# Altium PCB PCB1_ASCII.pcbdoc (part 1 of 3)
Units mm, origin at the board's own origin, x right, y up, seen from the top; angles counter-clockwise.
Board outline 135 x 100 mm, 4 copper layers (Top Layer, GND, VCC, Bottom Layer), stack 1.757 mm thick; 175 components, 160 nets, 705 pads, 758 vias.
Unrouted connection lines stored in the file: 8.
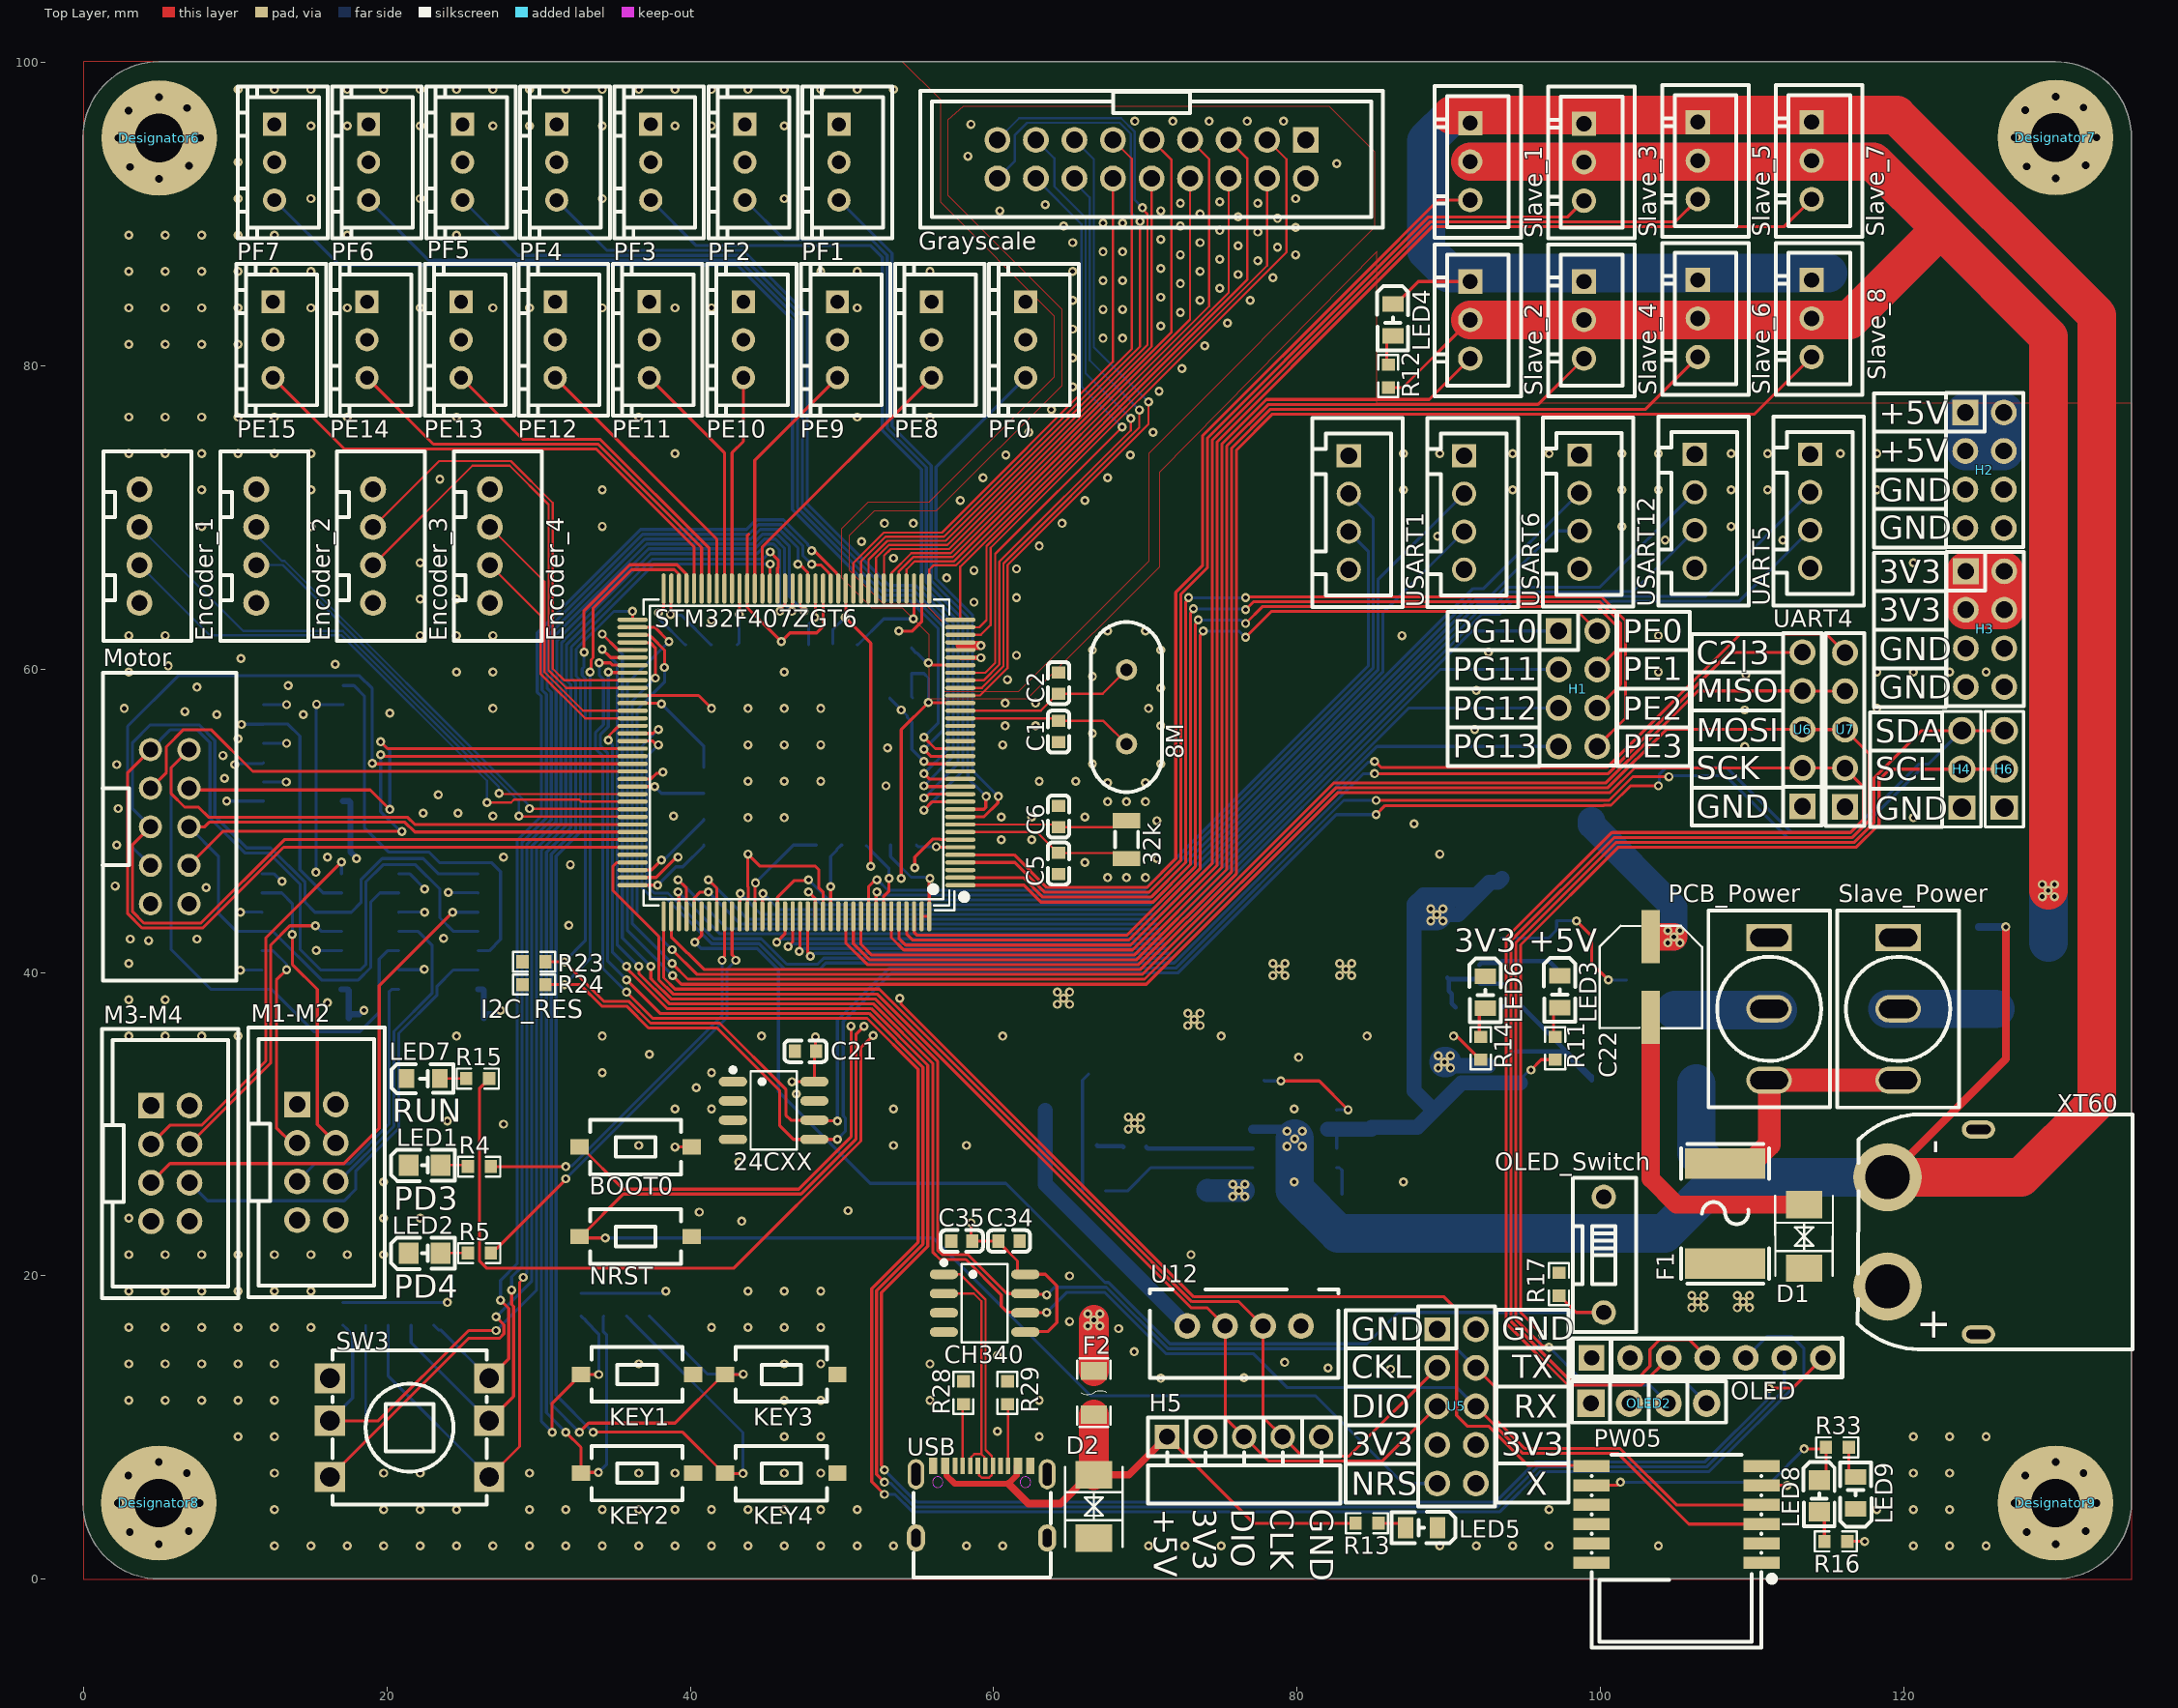
[diagram p0: Top Layer view]
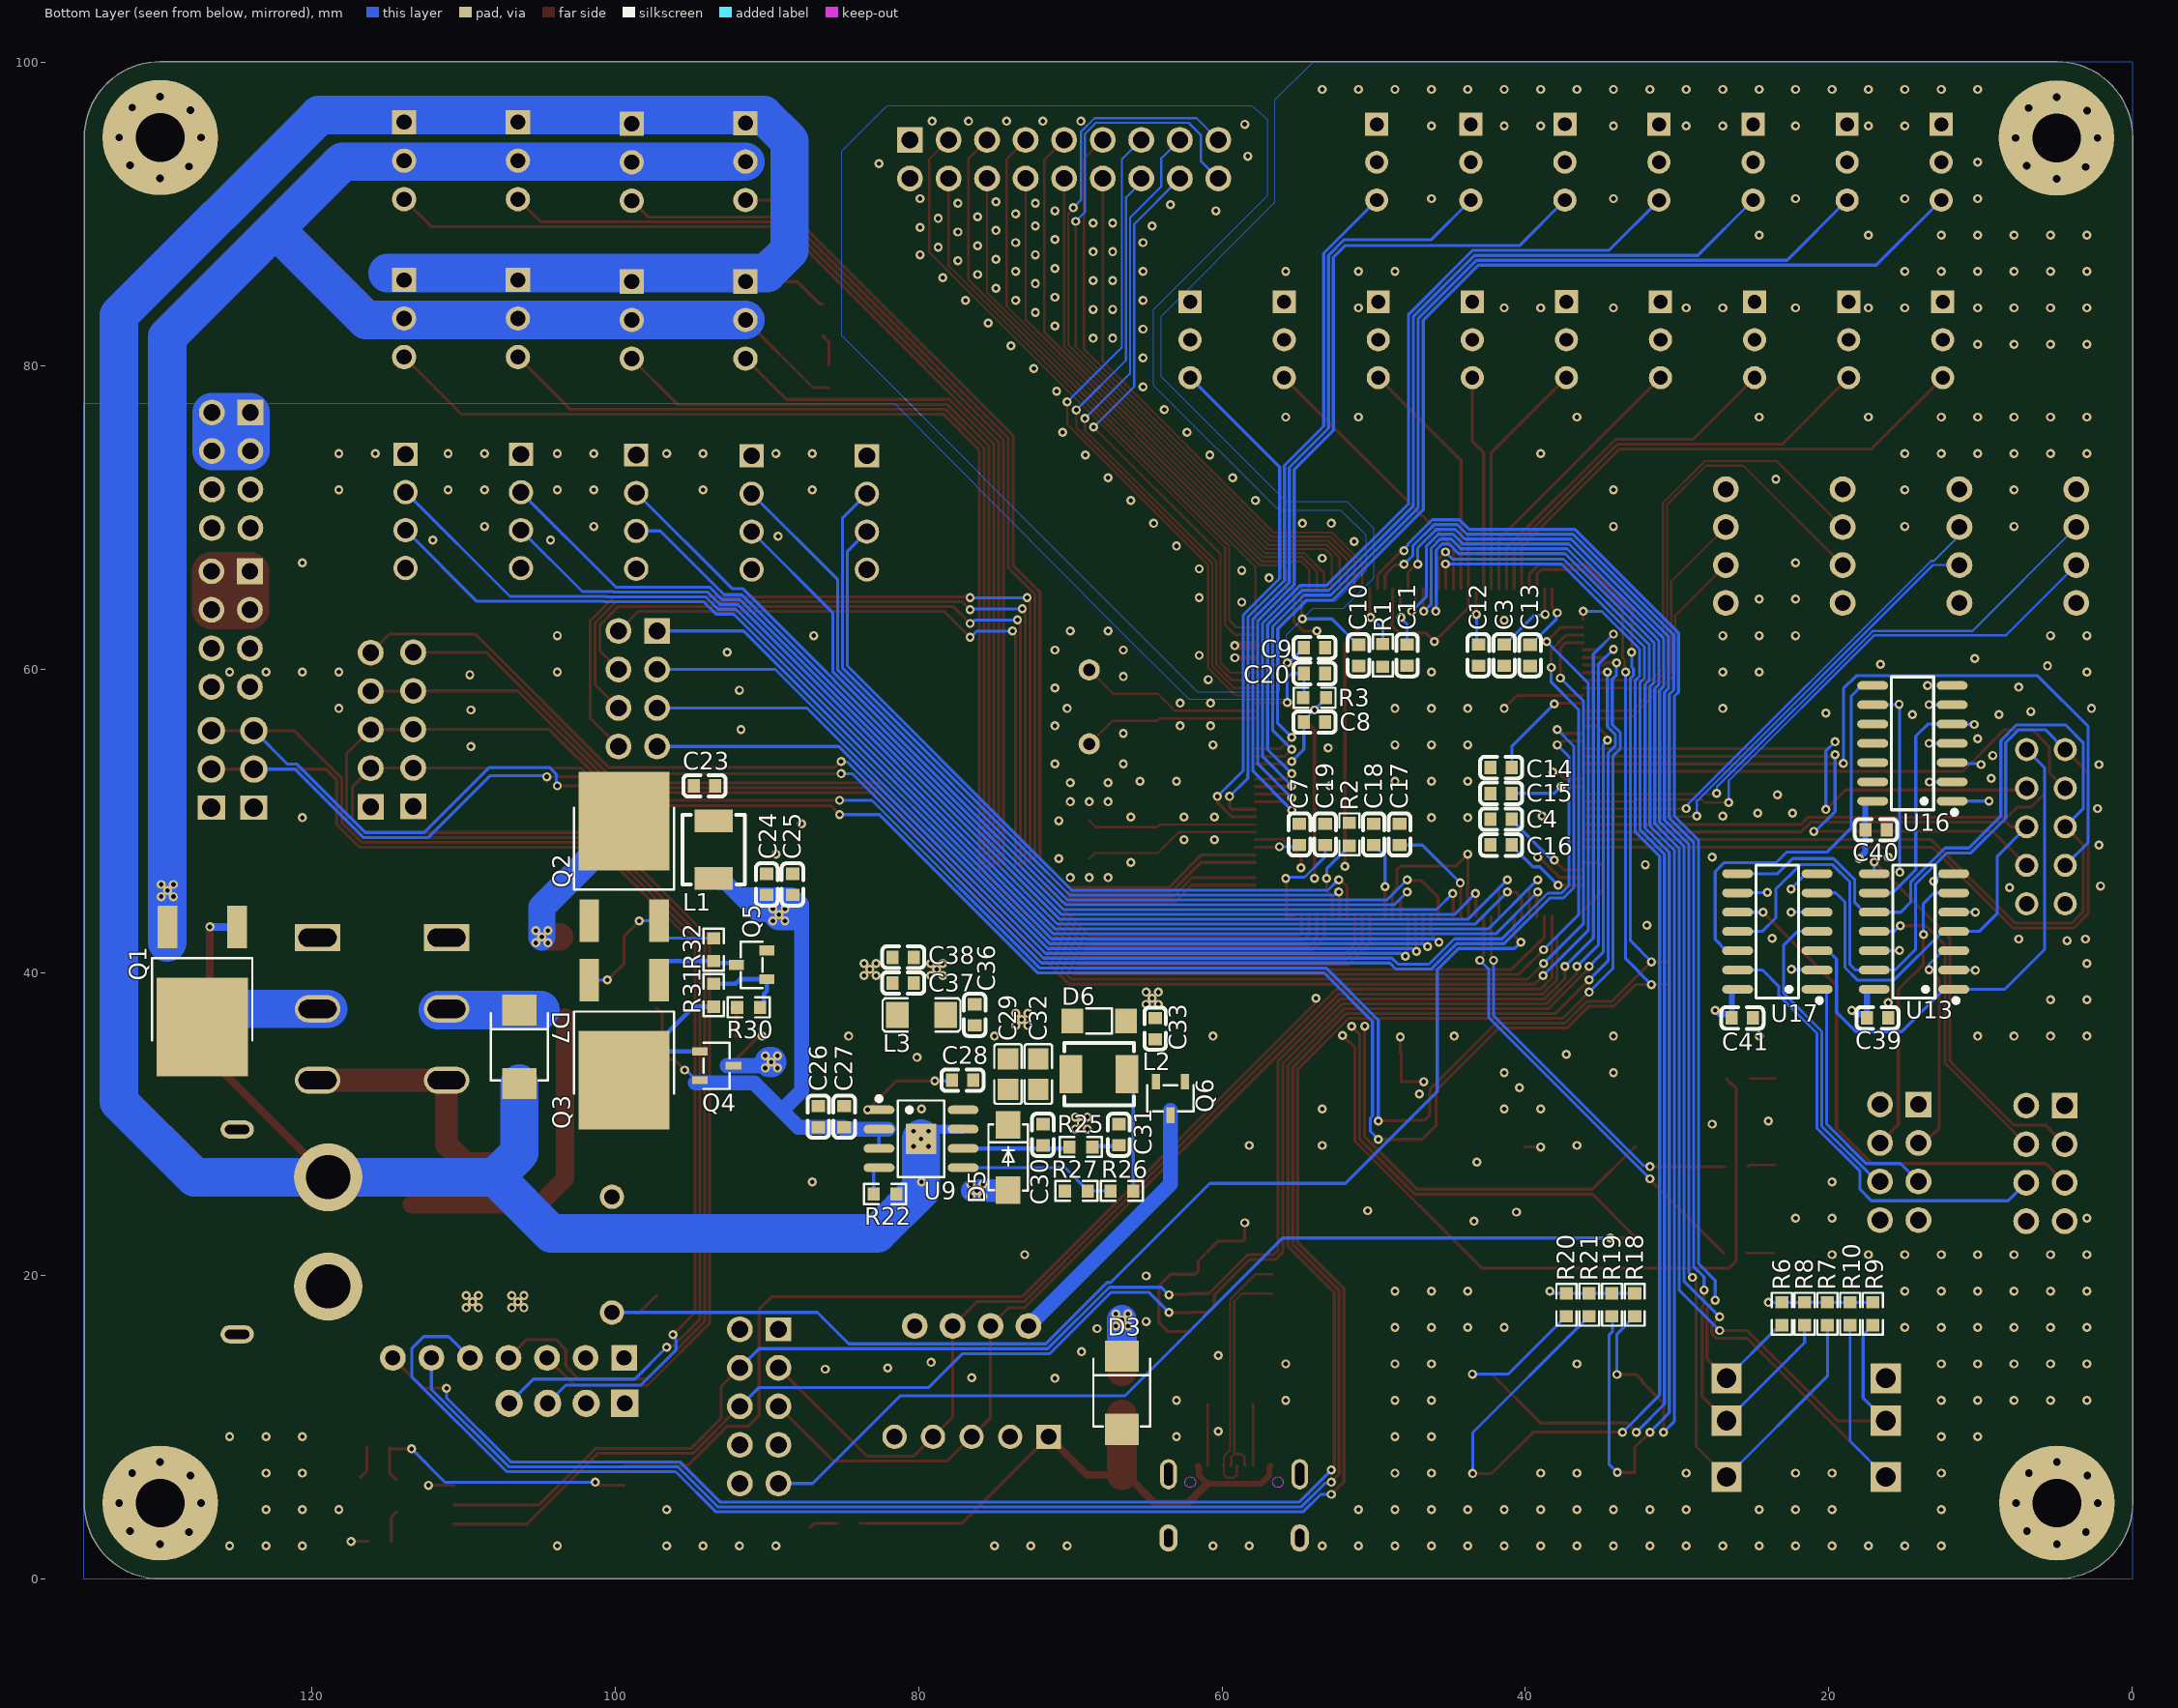
[diagram p1: Bottom Layer view, seen from below]
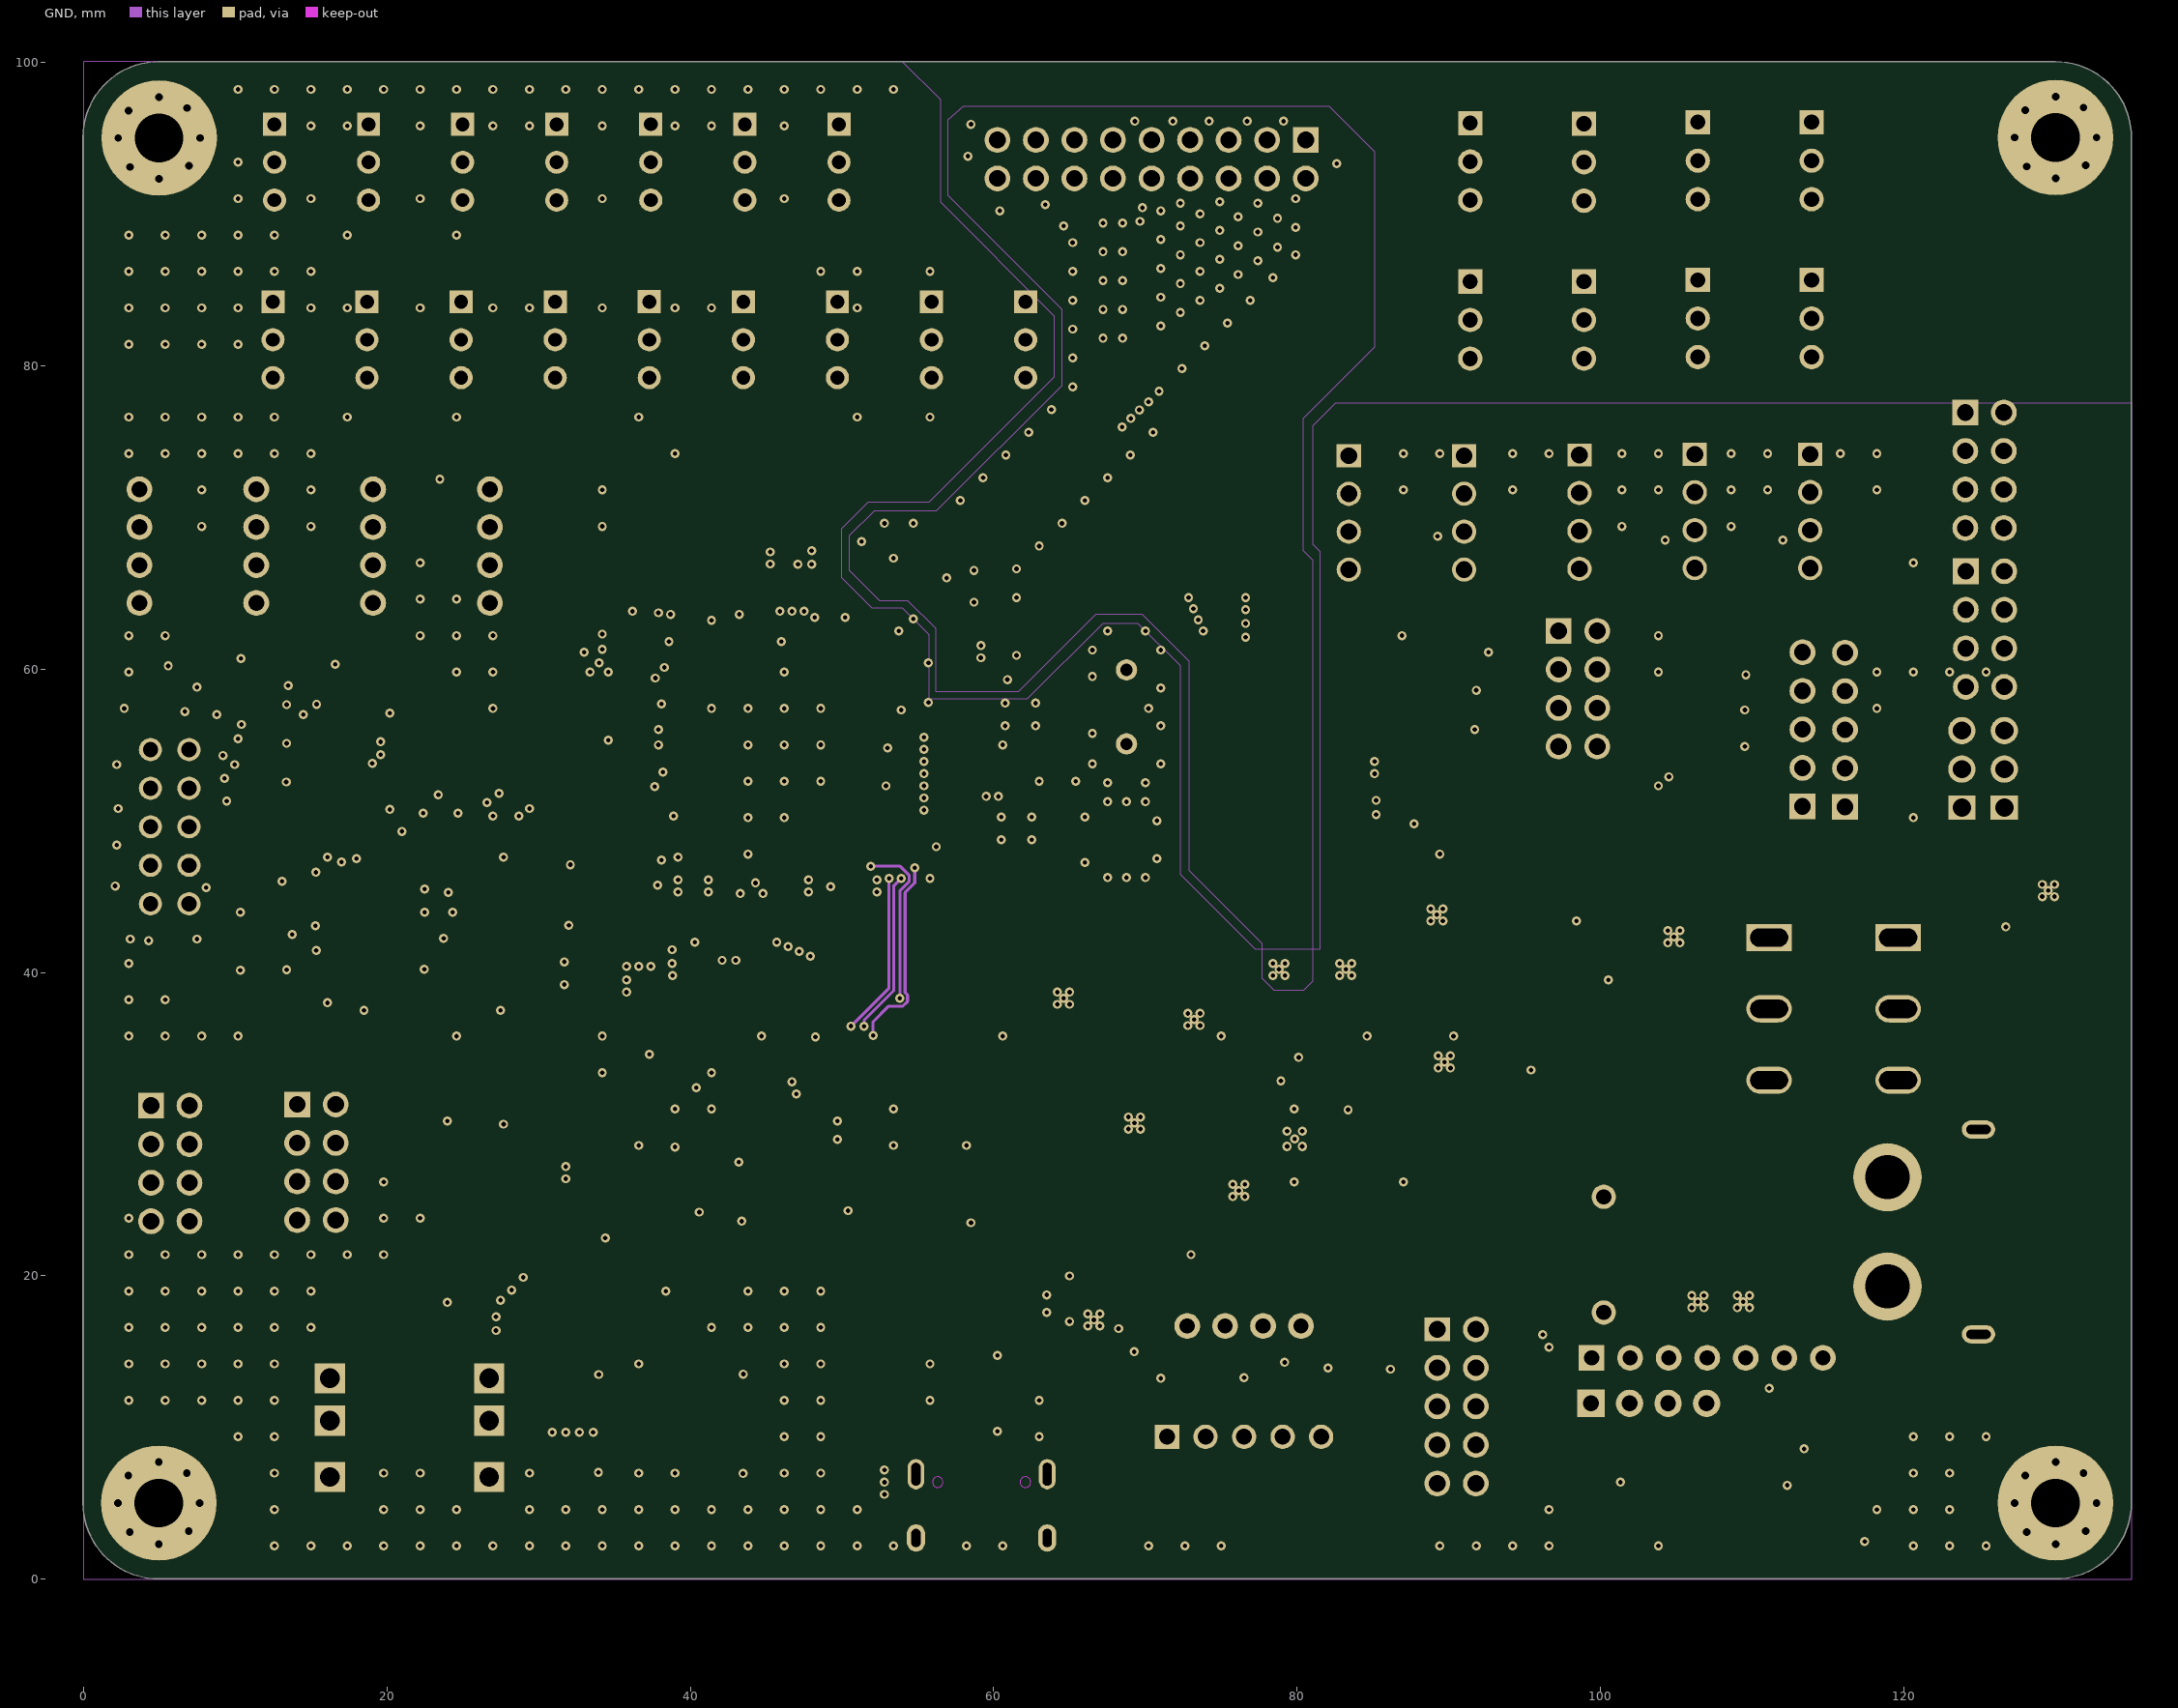
[diagram p2: GND]
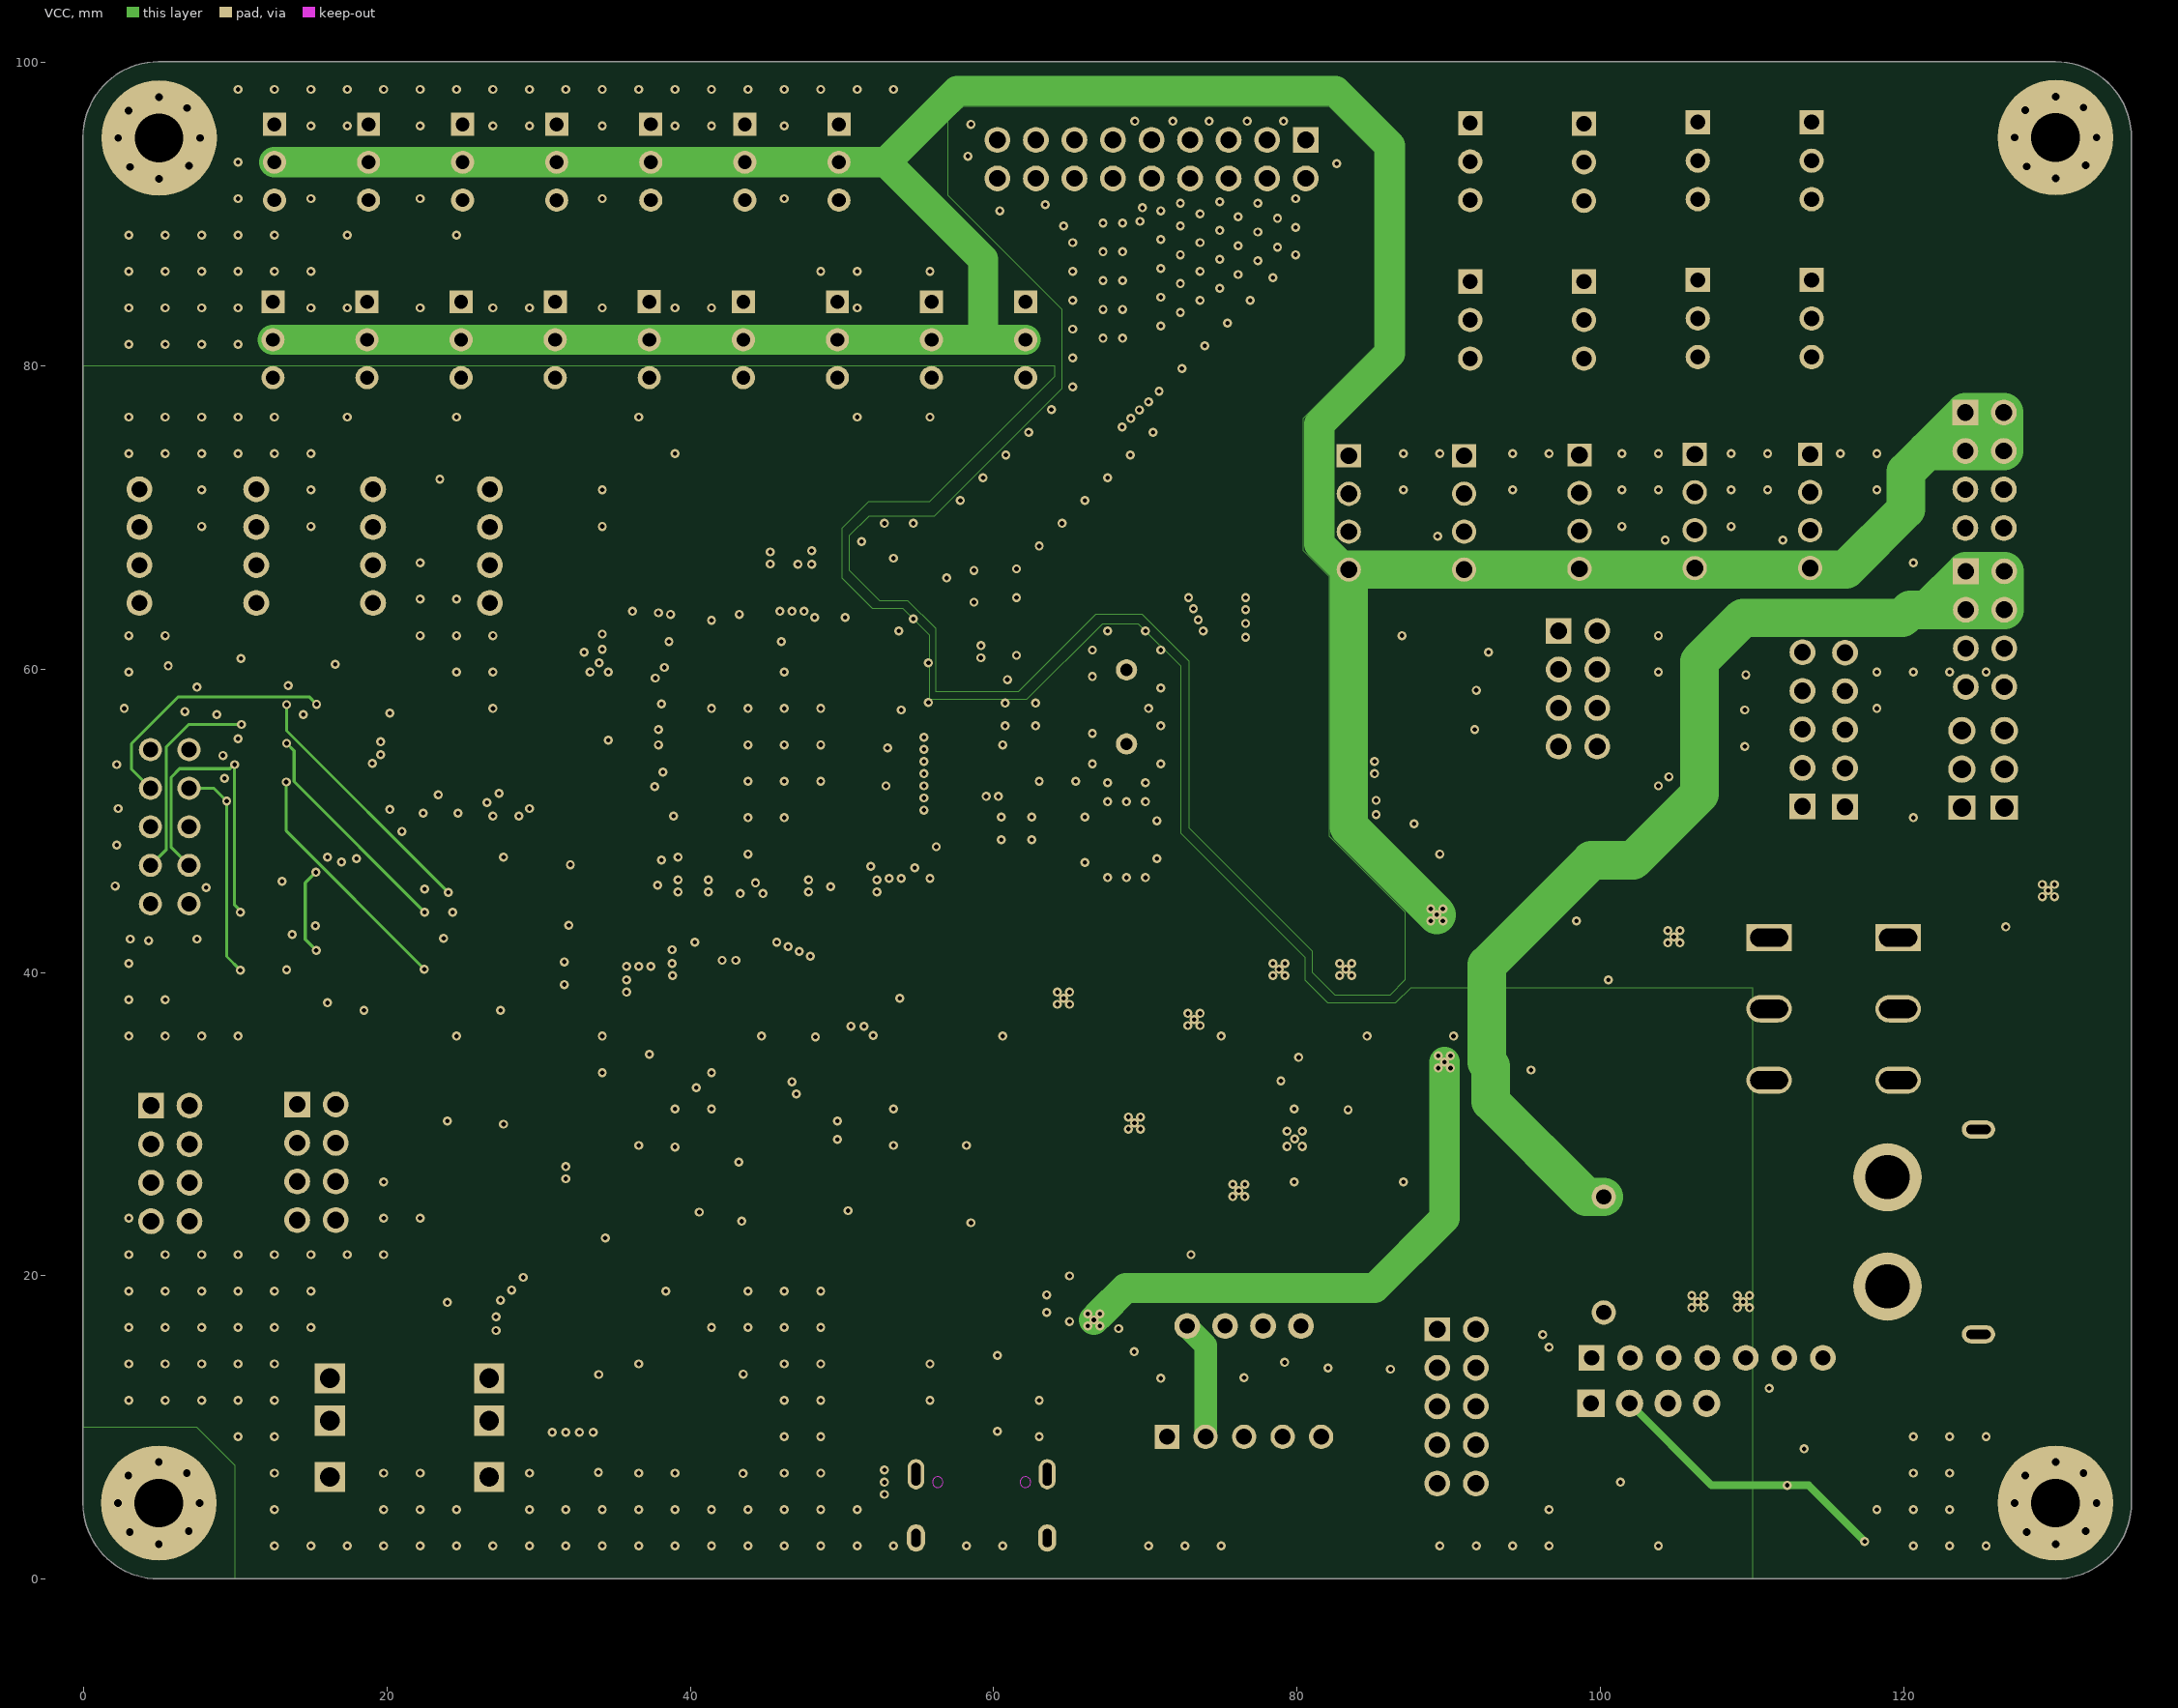
[diagram p3: VCC]

## Layer stack, top to bottom
Top Solder Mask Layer: solder mask 0.0102, Dk 3.3
Top Layer: signal copper 0.035
Dielectric 1: prepreg 0.0711, PP-006, Dk 4.1
GND: signal copper 0.018
Dielectric1: surface 1.5088, FR4, Dk 4.5
VCC: signal copper 0.018
Dielectric 2: prepreg 0.0711, PP-006, Dk 4.1
Bottom Layer: signal copper 0.035
Bottom Solder Mask Layer: solder mask 0.0102, Dk 3.3

## Board outline
-0.023,5.028 -0.023,95.028 cw(c4.977,95.028) 4.977,100.028 129.977,100.028 cw(c129.977,95.028) 134.977,95.028 134.977,5.028 cw(c129.977,5.028) 129.977,0.028 4.977,0.028 cw(c4.977,5.028)

## Design rules (kind name [scope] priority, off if disabled: settings)
AssemblyTestPointUsage [All] p0: scope1count=1 scope1_0_kind=Board scope1_0_value=Board scope2count=1 scope2_0_kind=Board scope2_0_value=Board commentlength=0
AssemblyTestpoint [All] p0: scope1count=1 scope1_0_kind=Board scope1_0_value=Board scope2count=1 scope2_0_kind=Board scope2_0_value=Board commentlength=0
BoardOutlineClearance copperThickness2oz_1 [All] p0: scope1count=1 scope1_0_kind=Board scope1_0_value=Board scope2count=1 scope2_0_kind=Board scope2_0_value=Board commentlength=0 gap=0.254
BoardOutlineClearance copperThickness1oz_1 [All] p0: scope1count=1 scope1_0_kind=Board scope1_0_value=Board scope2count=1 scope2_0_kind=Board scope2_0_value=Board commentlength=0 gap=0.254
BoardOutlineClearance copperThickness1oz_1 [All] p1: gap=0.254 ignorepadtopadclearanceinfootprint=FALSE except(0: Arc-SplitContinuation Track-SplitContinuation SMDPad-SplitContinuation THPad-SplitContinuation Via-SplitContinuation Fill-SplitContinuation Poly-SplitContinuation Region-SplitContinuation Text-SplitContinuation; 0.152: Track-CutoutEdge SMDPad-CutoutEdge THPad-CutoutEdge Via-CutoutEdge Region-CutoutEdge; 0.3: Track-OutlineEdge SMDPad-OutlineEdge THPad-OutlineEdge Via-OutlineEdge Fill-OutlineEdge Fill-CutoutEdge Poly-OutlineEdge Region-OutlineEdge Text-OutlineEdge)
BoardOutlineClearance copperThickness2oz_1 [All] p2: gap=0.254 ignorepadtopadclearanceinfootprint=FALSE except(0: Arc-SplitContinuation Track-SplitContinuation SMDPad-SplitContinuation THPad-SplitContinuation Via-SplitContinuation Fill-SplitContinuation Poly-SplitContinuation Region-SplitContinuation Text-SplitContinuation; 0.152: Track-CutoutEdge SMDPad-CutoutEdge THPad-CutoutEdge Via-CutoutEdge Region-CutoutEdge; 0.3: Track-OutlineEdge SMDPad-OutlineEdge THPad-OutlineEdge Via-OutlineEdge Fill-OutlineEdge Fill-CutoutEdge Poly-OutlineEdge Region-OutlineEdge Text-OutlineEdge)
Clearance copperThickness1oz [All] p0: scope1count=1 scope1_0_kind=Board scope1_0_value=Board scope2count=1 scope2_0_kind=Board scope2_0_value=Board commentlength=0 gap=0.2
Clearance "Stitching GND" [All] p0 off: scope1count=1 scope1_0_kind=Board scope1_0_value=Board scope2count=1 scope2_0_kind=Board scope2_0_value=Board commentlength=80 gap=0.2 // Protel DXP Scope 2 Expression Was: (IsVia and (Not IsStitchingVia)) Or IsPad
Clearance "Stitching GND" [IsStitchingVia and InNet('GND') vs (IsVia and (Not IsStitchingVia)) Or IsPad] p1: gap=0.2 ignorepadtopadclearanceinfootprint=FALSE except(0: Arc-Text Arc-Hole Track-Text Track-Hole SMDPad-Text SMDPad-Hole THPad-Text THPad-Hole Via-Text Via-Hole Fill-Text Fill-Hole Poly-Text Poly-Hole Region-Text Region-Hole Text-Text Text-Hole)
Clearance copperThickness1oz [All] p2: gap=0.2 ignorepadtopadclearanceinfootprint=FALSE except(0: Arc-Text Arc-Hole Track-Text Track-Hole SMDPad-Via SMDPad-Text SMDPad-Hole THPad-Via THPad-Text THPad-Hole Via-Text Via-Hole Fill-Text Fill-Hole Poly-Text Poly-Hole Region-Text Region-Hole Text-Text Text-Hole; 0.12: Arc-Arc Arc-Track Arc-Via Track-Track Track-Via; 0.15: Arc-SMDPad Arc-THPad Track-SMDPad Track-THPad SMDPad-SMDPad SMDPad-THPad THPad-THPad)
ComponentClearance [All] p0: scope1count=1 scope1_0_kind=Board scope1_0_value=Board scope2count=1 scope2_0_kind=Board scope2_0_value=Board commentlength=0 gap=0 collisioncheckmode=3
ComponentClearance [All] p1: gap=0 collisioncheckmode=3 verticalgap=0.254 showdistances=FALSE
DiffPairsRouting DiffPairsRouting_85oum [All] p0 off: scope1count=1 scope1_0_kind=Board scope1_0_value=Board scope2count=1 scope2_0_kind=Board scope2_0_value=Board commentlength=71 // Protel DXP Scope 1 Expression Was: InDifferentialPairClass('85oum')
DiffPairsRouting DiffPairsRouting_90oum [All] p0 off: scope1count=1 scope1_0_kind=Board scope1_0_value=Board scope2count=1 scope2_0_kind=Board scope2_0_value=Board commentlength=71 // Protel DXP Scope 1 Expression Was: InDifferentialPairClass('90oum')
DiffPairsRouting DiffPairsRouting_90oum [InDifferentialPairClass('90oum')] p1: maxlimit=0.254 minlimit=0.1 mostfreqgap=0.12 toplayer_minwidth=0.1 toplayer_maxwidth=0.381 toplayer_prefwidth=0.125 midlayer1_minwidth=0.1 midlayer1_maxwidth=0.381 midlayer1_prefwidth=0.125 midlayer2_minwidth=0.1 midlayer2_maxwidth=0.381 midlayer2_prefwidth=0.125 bottomlayer_minwidth=0.1 bottomlayer_maxwidth=0.381 bottomlayer_prefwidth=0.125 maxuncoupledlength=12.7
DiffPairsRouting DiffPairsRouting_85oum [InDifferentialPairClass('85oum')] p2: maxlimit=0.254 minlimit=0.1 mostfreqgap=0.12 toplayer_minwidth=0.1 toplayer_maxwidth=0.381 toplayer_prefwidth=0.145 midlayer1_minwidth=0.1 midlayer1_maxwidth=0.381 midlayer1_prefwidth=0.145 midlayer2_minwidth=0.1 midlayer2_maxwidth=0.381 midlayer2_prefwidth=0.145 bottomlayer_minwidth=0.1 bottomlayer_maxwidth=0.381 bottomlayer_prefwidth=0.145 maxuncoupledlength=12.7
FabricationTestPointUsage [All] p0: scope1count=1 scope1_0_kind=Board scope1_0_value=Board scope2count=1 scope2_0_kind=Board scope2_0_value=Board commentlength=0 valid=0 allowmultiple=FALSE
FabricationTestpoint [All] p0: scope1count=1 scope1_0_kind=Board scope1_0_value=Board scope2count=1 scope2_0_kind=Board scope2_0_value=Board commentlength=0 side=3 testpointundercomponent=TRUE minsize=1.016 maxsize=2.54 preferedsize=1.524 minholesize=0 maxholesize=1.016 preferedholesize=0.813 testpointgrid=0.025
FanoutControl Fanout_Default [All] p0: scope1count=1 scope1_0_kind=Board scope1_0_value=Board scope2count=1 scope2_0_kind=Board scope2_0_value=Board commentlength=30 // Fanout_Default (Default Rule)
FanoutControl Fanout_Small [All] p0 off: scope1count=1 scope1_0_kind=Board scope1_0_value=Board scope2count=1 scope2_0_kind=Board scope2_0_value=Board commentlength=84 // Protel DXP Scope 1 Expression Was: (CompPinCount < 5)   Fanout_Small (Default Rule)
FanoutControl Fanout_SOIC [All] p0 off: scope1count=1 scope1_0_kind=Board scope1_0_value=Board scope2count=1 scope2_0_kind=Board scope2_0_value=Board commentlength=71 // Protel DXP Scope 1 Expression Was: IsSOIC   Fanout_SOIC (Default Rule)
FanoutControl Fanout_LCC [All] p0 off: scope1count=1 scope1_0_kind=Board scope1_0_value=Board scope2count=1 scope2_0_kind=Board scope2_0_value=Board commentlength=69 // Protel DXP Scope 1 Expression Was: IsLCC   Fanout_LCC (Default Rule)
FanoutControl Fanout_BGA [All] p0 off: scope1count=1 scope1_0_kind=Board scope1_0_value=Board scope2count=1 scope2_0_kind=Board scope2_0_value=Board commentlength=69 // Protel DXP Scope 1 Expression Was: IsBGA   Fanout_BGA (Default Rule)
Height [All] p0: scope1count=1 scope1_0_kind=Board scope1_0_value=Board scope2count=1 scope2_0_kind=Board scope2_0_value=Board commentlength=0
HoleSize [All] p0: scope1count=1 scope1_0_kind=Board scope1_0_value=Board scope2count=1 scope2_0_kind=Board scope2_0_value=Board commentlength=0 absolutevalues=TRUE maxlimit=2.54 minlimit=0.025 maxpercent=80.000 minpercent=20.000
HoleToHoleClearance [All] p0: scope1count=1 scope1_0_kind=Board scope1_0_value=Board scope2count=1 scope2_0_kind=Board scope2_0_value=Board commentlength=0
LayerPairs [All] p0: scope1count=1 scope1_0_kind=Board scope1_0_value=Board scope2count=1 scope2_0_kind=Board scope2_0_value=Board commentlength=0 enforce=TRUE
MatchedLengths [All] p0: scope1count=1 scope1_0_kind=Board scope1_0_value=Board scope2count=1 scope2_0_kind=Board scope2_0_value=Board commentlength=0 tolerance=2 amplitude=5.08 gap=0.508 style=90-Degree
MatchedLengths [All] p1: tolerance=2 checknetsindiffpair=FALSE checkdiffpairvsdiffpair=TRUE checkxsignals=TRUE checkothers=TRUE
MinimumSolderMaskSliver [All] p0: scope1count=1 scope1_0_kind=Board scope1_0_value=Board scope2count=1 scope2_0_kind=Board scope2_0_value=Board commentlength=0
NetAntennae [All] p0: scope1count=1 scope1_0_kind=Board scope1_0_value=Board scope2count=1 scope2_0_kind=Board scope2_0_value=Board commentlength=0
PasteMaskExpansion pasteMaskExpansion [All] p0: scope1count=1 scope1_0_kind=Board scope1_0_value=Board scope2count=1 scope2_0_kind=Board scope2_0_value=Board commentlength=0 expansion=0
PasteMaskExpansion pasteMaskExpansion [All] p1: expansion=0
PlaneClearance [All] p0: scope1count=1 scope1_0_kind=Board scope1_0_value=Board scope2count=1 scope2_0_kind=Board scope2_0_value=Board commentlength=0 clearance=0.508
PlaneConnect innerPlane [All] p0: scope1count=1 scope1_0_kind=Board scope1_0_value=Board scope2count=1 scope2_0_kind=Board scope2_0_value=Board commentlength=0 planeconnectstyle=Direct reliefexpansion=0.508 reliefentries=4 reliefconductorwidth=0.254 reliefairgap=0.254
PlaneConnect innerPlane [All] p1: planeconnectstyle=Direct reliefexpansion=0.508 reliefentries=4 reliefconductorwidth=0.254 reliefairgap=0.254
PolygonConnect copperRegion [All] p0: scope1count=1 scope1_0_kind=Board scope1_0_value=Board scope2count=1 scope2_0_kind=Board scope2_0_value=Board commentlength=0 connectstyle=Direct reliefconductorwidth=0.254 reliefentries=4 polygonreliefangle="90 Angle"
PolygonConnect copperRegion [All] p1: thpad.connectstyle=Direct thpad.reliefconductorwidth=0.254 thpad.reliefentries=4 thpad.polygonreliefangle="90 Angle" thpad.airgapwidth=0.254 smdpad.connectstyle=Relief smdpad.reliefconductorwidth=0.3 smdpad.reliefentries=4 smdpad.polygonreliefangle="90 Angle" smdpad.airgapwidth=0.3 via.connectstyle=Direct via.reliefconductorwidth=0.254 via.reliefentries=4 via.polygonreliefangle="90 Angle" via.airgapwidth=0.254
RoutingCorners [All] p0: scope1count=1 scope1_0_kind=Board scope1_0_value=Board scope2count=1 scope2_0_kind=Board scope2_0_value=Board commentlength=0 cornerstyle=45-Degree minsetback=2.54 maxsetback=2.54
RoutingLayers [All] p0: scope1count=1 scope1_0_kind=Board scope1_0_value=Board scope2count=1 scope2_0_kind=Board scope2_0_value=Board commentlength=0 top layer=Automatic mid layer 1=Automatic mid layer 2=Automatic bottom layer=Automatic
RoutingPriority [All] p0: scope1count=1 scope1_0_kind=Board scope1_0_value=Board scope2count=1 scope2_0_kind=Board scope2_0_value=Board commentlength=0
RoutingTopology [All] p0: scope1count=1 scope1_0_kind=Board scope1_0_value=Board scope2count=1 scope2_0_kind=Board scope2_0_value=Board commentlength=0 topology=Shortest
RoutingVias viaSize [All] p0: scope1count=1 scope1_0_kind=Board scope1_0_value=Board scope2count=1 scope2_0_kind=Board scope2_0_value=Board commentlength=0 holewidth=0.305 width=0.61 viastyle="Through Hole" minholewidth=0.3 minwidth=0.5 maxholewidth=6.3 maxwidth=10
RoutingVias viaSize [All] p1: holewidth=0.305 width=0.61 viastyle="Through Hole" minholewidth=0.3 minwidth=0.5 maxholewidth=6.3 maxwidth=10
ShortCircuit [All] p0: scope1count=1 scope1_0_kind=Board scope1_0_value=Board scope2count=1 scope2_0_kind=Board scope2_0_value=Board commentlength=0 allowed=FALSE
SilkToBoardRegionClearance [All] p0: scope1count=1 scope1_0_kind=Board scope1_0_value=Board scope2count=1 scope2_0_kind=Board scope2_0_value=Board commentlength=0
SilkToSilkClearance [All] p0: scope1count=1 scope1_0_kind=Board scope1_0_value=Board scope2count=1 scope2_0_kind=Board scope2_0_value=Board commentlength=0
SilkToSilkClearance [All] p1: silktosilkclearance=0
SilkToSolderMaskClearance [All] p0 off: scope1count=1 scope1_0_kind=Board scope1_0_value=Board scope2count=1 scope2_0_kind=Board scope2_0_value=Board commentlength=44 // Protel DXP Scope 1 Expression Was: IsPad
SilkToSolderMaskClearance [IsPad] p1: minsilkscreentomaskgap=0 clearancetoexposedcopper=TRUE
SolderMaskExpansion solderMaskExpansion [All] p0: scope1count=1 scope1_0_kind=Board scope1_0_value=Board scope2count=1 scope2_0_kind=Board scope2_0_value=Board commentlength=0 expansion=0.051
SolderMaskExpansion solderMaskExpansion [All] p1: expansion=0.051 istentingtop=FALSE useseparateexpansions=TRUE expansionbottom=0.051 istentingbottom=FALSE
SupplyNets "Schematic Supply Nets" [All] p0: scope1count=1 scope1_0_kind=Net scope1_0_value=3V3 scope2count=1 scope2_0_kind=Board scope2_0_value=Board commentlength=0 voltage=0.000
SupplyNets "Schematic Supply Nets_1" [All] p0: scope1count=1 scope1_0_kind=Net scope1_0_value=VDDREG scope2count=1 scope2_0_kind=Board scope2_0_value=Board commentlength=0 voltage=0.000
SupplyNets "Schematic Supply Nets_2" [All] p0: scope1count=1 scope1_0_kind=Net scope1_0_value=GND scope2count=1 scope2_0_kind=Board scope2_0_value=Board commentlength=0 voltage=0.000
SupplyNets "Schematic Supply Nets_3" [All] p0: scope1count=1 scope1_0_kind=Net scope1_0_value=AVDDL scope2count=1 scope2_0_kind=Board scope2_0_value=Board commentlength=0 voltage=0.000
SupplyNets "Schematic Supply Nets_4" [All] p0: scope1count=1 scope1_0_kind=Net scope1_0_value=M.2_3V3 scope2count=1 scope2_0_kind=Board scope2_0_value=Board commentlength=0 voltage=0.000
SupplyNets "Schematic Supply Nets_5" [All] p0: scope1count=1 scope1_0_kind=Net scope1_0_value=VCC scope2count=1 scope2_0_kind=Board scope2_0_value=Board commentlength=0 voltage=0.000
SupplyNets "Schematic Supply Nets_5" [InNet('VCC')] p1: voltage=0.000
SupplyNets "Schematic Supply Nets_4" [InNet('M.2_3V3')] p2: voltage=0.000
SupplyNets "Schematic Supply Nets_3" [InNet('AVDDL')] p3: voltage=0.000
SupplyNets "Schematic Supply Nets_2" [InNet('GND')] p4: voltage=0.000
SupplyNets "Schematic Supply Nets_1" [InNet('VDDREG')] p5: voltage=0.000
SupplyNets "Schematic Supply Nets" [InNet('3V3')] p6: voltage=0.000
UnRoutedNet [All] p0: scope1count=1 scope1_0_kind=Board scope1_0_value=Board scope2count=1 scope2_0_kind=Board scope2_0_value=Board commentlength=0
UnpouredPolygon [All] p0: scope1count=1 scope1_0_kind=Board scope1_0_value=Board scope2count=1 scope2_0_kind=Board scope2_0_value=Board commentlength=0
Width copperThickness1oz_2 [All] p0: scope1count=1 scope1_0_kind=Board scope1_0_value=Board scope2count=1 scope2_0_kind=Board scope2_0_value=Board commentlength=0 maxlimit=2.54 minlimit=0.127 preferedwidth=0.254
Width copperThickness1oz_2 [All] p1: maxlimit=2.54 minlimit=0.127 preferedwidth=0.254
24 further rules are at their usual default settings.

## Components (designator, comment, footprint, x,y, rotation, side; value= is the part's Value field where it differs from the comment)
8M "8MHz" CRYSTAL-TH_L11.1-W4.7-P4.88 68.75,57.5 r270 top (schematic designator X1)
24CXX "AT24C64" SOP-8_L4.9-W3.9-P1.27-LS6.0-BL#1 45.5,30.9 r270 top locked (schematic designator U2)
32k "32.768kHz" FC-135R_L3.2-W1.5 68.75,48.75 r270 top (schematic designator X2)
BOOT0 "TS-1101-C-W" SW-SMD_L6.0-W3.3-LS8.0_TS-1101-C-W 36.4,28.5 r0 top locked (schematic designator SW1)
C1 "100nF" C0603#1 64.275,55.875 r90 top
C2 "100nF" C0603#1 64.275,59.075 r270 top
C3 "100nF" C0603#1 41.4,60.9 r270 bottom
C4 "100nF" C0603#1 41.6,50.1 r0 bottom
C5 "100nF" C0603#1 64.275,47.175 r90 top
C6 "100nF" C0603#1 64.275,50.275 r270 top
C7 "100nF" C0603#1 54.9,49.1 r270 bottom
C8 "100nF" C0603#2 53.9,56.5 r0 bottom
C9 "100nF" C0603#1 53.9,61.4 r0 bottom
C10 "100nF" C0603#1 51,60.9 r90 bottom
C11 "100nF" C0603#2 47.8,60.9 r90 bottom
C12 "100nF" C0603#2 43.1,60.9 r90 bottom
C13 "100nF" C0603#1 39.7,60.9 r90 bottom
C14 "100nF" C0603#3 41.6,53.5 r180 bottom
C15 "100nF" C0603#2 41.6,51.8 r180 bottom
C16 "100nF" C0603#1 41.6,48.4 r180 bottom
C17 "100nF" C0603#3 48.3,49.1 r270 bottom
C18 "100nF" C0603#2 50,49.1 r270 bottom
C19 "100nF" C0603#1 53.2,49.1 r270 bottom
C20 "100nF" C0603#3 53.899,59.7 r0 bottom
C21 "100nF" C0603#2 47.6,34.8 r180 top
C22 "470uF" CAP-SMD_BD6.3-L6.6-W6.6-LS7.3-FD-H7.7 103.3,39.7 r270 top
C23 "100nF" C0603#3 94.1,52.3 r0 bottom
C24 "100nF" C0603#1 90,45.8 r270 bottom
C25 "100nF" C0603#1 88.3,45.8 r270 bottom
C26 "100nF" C0603#3 86.6,30.5 r270 bottom
C27 "100nF" C0603#2 84.9,30.5 r270 bottom
C28 "100nF" C0603#2 77.1,32.9 r0 bottom
C29 "47uF" C0805#1 74.1,33.3 r270 bottom
C30 "100nF" C0603#2 71.8,29.3 r270 bottom
C31 "100nF" C0603#1 66.8,29.3 r270 bottom
C32 "47uF" C0805#2 72.1,33.3 r270 bottom
C33 "100nF" C0603#3 64.4,36.3 r90 bottom
C34 "100nF" C0603#2 61,22.3 r0 top
C35 "100nF" C0603#2 57.9,22.3 r180 top
C36 "100nF" C0603#2 76.3,37.2 r90 bottom
C37 "100nF" C0603#3 81,39.3 r0 bottom
C38 "100nF" C0603#2 81,41 r0 bottom
C39 "100nF" C0603#1 16.8,37 r180 bottom
C40 "100nF" C0603#1 16.9,49.4 r180 bottom
C41 "100nF" C0603#3 25.7,37 r180 bottom
CH340 "CH340N" SOP-8_L4.9-W3.9-P1.27-LS6.0-BL#2 59.4,18.2 r270 top locked (schematic designator U10)
D1 "SMBJ6.5CA" SMB_L4.6-W3.5-LS5.3-BI#1 113.4,22.6 r90 top
D2 "SMBJ6.5CA" SMB_L4.6-W3.5-LS5.3-BI#2 66.6,4.8 r270 top locked
D3 "SMBJ5339B" SMB_L4.6-W3.6-LS5.4-RD 66.6,12.3 r270 bottom
D5 "SS54" SMA_L4.3-W2.6-LS5.0-FD 74.1,27.8 r90 bottom
D6 "BZV55-C3V3,115-JSM" SOD-80_L3.5-W1.5-RD 68.1,36.8 r0 bottom
D7 "SMBJ5339B" SMB_L4.6-W3.6-LS5.4-RD 106.3,35.1 r270 bottom
Designator6 "Comment" M3 5,95 r0 top locked
Designator7 "Comment" M3 129.977,95.028 r0 top
Designator8 "Comment" M3 4.977,5.028 r0 top locked
Designator9 "Comment" M3 129.977,5.028 r0 top locked
Encoder_1 "HX-XH2.54-4PZZ" CONN-TH_4P-P2.50-XH2.54-4P#1 3.7,68.1 r90 top locked (schematic designator CN25)
Encoder_2 "HX-XH2.54-4PZZ" CONN-TH_4P-P2.50-XH2.54-4P#2 11.4,68.1 r90 top locked (schematic designator CN31)
Encoder_3 "HX-XH2.54-4PZZ" CONN-TH_4P-P2.50-XH2.54-4P#1 19.1,68.1 r90 top locked (schematic designator CN26)
Encoder_4 "HX-XH2.54-4PZZ" CONN-TH_4P-P2.50-XH2.54-4P#2 26.8,68.1 r90 top locked (schematic designator CN32)
F1 "2920L500/24GR" F2920 108.2,24.1 r90 top
F2 "SMD1206-100-30" F1206 66.6,12.3 r90 top
Grayscale "XDFH-0254-2*9P" CONN-TH_18P-P2.54_LX_XDFH-0254-2X9P 70.4,93.6 r180 top locked (schematic designator U8)
H1 "PZ254V-12-8P" HDR-TH_8P-P2.54-V-M-R2-C4-S2.54 98.5,58.7 r270 top
H2 "PZ254V-12-8P" HDR-TH_8P-P2.54-V-M-R2-C4-S2.54 125.3,73.1 r270 top
H3 "PZ254V-12-8P" HDR-TH_8P-P2.54-V-M-R2-C4-S2.54 125.33,62.63 r270 top
H4 "12251103CNG0S115001" HDR-TH_3P-P2.54-V-M-1 123.8,53.4 r90 top
H5 "PZ254-1-05-W-8.5" HDR-TH_5P-P2.54-H-M-W10.4-N 76.5,9.4 r0 top
H6 "12251103CNG0S115001" HDR-TH_3P-P2.54-V-M-1 126.6,53.4 r90 top
KEY1 "TS-1101-C-W" SW-SMD_L6.0-W3.3-LS8.0_TS-1101-C-W 36.5,13.5 r0 top (schematic designator SW5)
KEY2 "TS-1101-C-W" SW-SMD_L6.0-W3.3-LS8.0_TS-1101-C-W 36.5,7 r0 top (schematic designator SW6)
KEY3 "TS-1101-C-W" SW-SMD_L6.0-W3.3-LS8.0_TS-1101-C-W 46,13.5 r0 top (schematic designator SW7)
KEY4 "TS-1101-C-W" SW-SMD_L6.0-W3.3-LS8.0_TS-1101-C-W 46,7 r0 top (schematic designator SW8)
L1 "4.7uH" IND-SMD_L4.6-W4.1-A 93.5,48.1 r270 bottom
L2 "2.2uH" IND-SMD_L4.6-W4.1_MHCI04015 68.1,33.3 r180 bottom
L3 "SBH3216S221QSP" L1206 79.8,37.2 r0 bottom
LED1 "GL0805UG01" LED0805-FD_GL0805UG01#1 22.5,27.3 r180 top
LED2 "GL0805UG01" LED0805-FD_GL0805UG01#1 22.498,21.5 r180 top
LED3 "GL0805UR01" LED0805-R-RD_RED#1 97.3,38.732 r270 top
LED4 "GL0805UR01" LED0805-R-RD_RED#1 86.3,83 r270 top
LED5 "GL0805UR01" LED0805-R-RD_RED#1 88.2,3.4 r180 top
LED6 "GL0805UR01" LED0805-R-RD_RED#1 92.4,38.7 r270 top
LED7 "GL0805UB01" LED0805-RD_BLUE 22.4,33 r0 top
LED8 "GL0805UG01" LED0805-FD_GL0805UG01#2 114.4,5.5 r90 top
LED9 "GL0805UR01" LED0805-R-RD_RED#2 116.8,5.7 r90 top
M1-M2 "XDFH-0254-2*4P" CONN-TH_8P-P2.54_LX_XDFH-0254-2X4P 15.37,27.49 r270 top locked (schematic designator U14)
M3-M4 "XDFH-0254-2*4P" CONN-TH_8P-P2.54_LX_XDFH-0254-2X4P 5.73,27.41 r270 top locked (schematic designator U15)
Motor "2.54-2*5P简牛" IDC-TH_10P-P2.54_C5665 5.7,49.6 r270 top locked (schematic designator P1)
NRST "TS-1101-C-W" SW-SMD_L6.0-W3.3-LS8.0_TS-1101-C-W 36.4,22.6 r0 top locked (schematic designator SW2)
OLED "HS96L01W4S03" OLED-TH_HS96L01W4S03 107.02,14.6 r0 top locked (schematic designator OLED1)
OLED2 "HS96L03W2C03" OLED-TH_L27.8-W27.2-P2.54_C9900033791 103.17,11.6 r0 top locked
OLED_Switch "DSWB01LHGET" SW-TH_DSWB01LHGET 100.2,21.4 r0 top (schematic designator SW4)
PCB_Power "MT-0-102-A101-M200-RS" SW-TH_MT-0-103-A101-M200-RS#1 111.1,37.602 r270 top locked (schematic designator U4)
PE8 "HX-XH2.54-3PZZ" CONN-TH_3P-P2.50_HC-XH-3A-G#1 55.9,81.7 r270 top (schematic designator CN15)
PE9 "HX-XH2.54-3PZZ" CONN-TH_3P-P2.50_HC-XH-3A-G#1 49.7,81.7 r270 top (schematic designator CN17)
PE10 "HX-XH2.54-3PZZ" CONN-TH_3P-P2.50_HC-XH-3A-G#1 43.5,81.7 r270 top (schematic designator CN19)
PE11 "HX-XH2.54-3PZZ" CONN-TH_3P-P2.50_HC-XH-3A-G#2 37.3,81.7 r270 top (schematic designator CN21)
PE12 "HX-XH2.54-3PZZ" CONN-TH_3P-P2.50_HC-XH-3A-G#3 31.1,81.7 r270 top (schematic designator CN23)
PE13 "HX-XH2.54-3PZZ" CONN-TH_3P-P2.50_HC-XH-3A-G#1 24.9,81.7 r270 top (schematic designator CN27)
PE14 "HX-XH2.54-3PZZ" CONN-TH_3P-P2.50_HC-XH-3A-G#1 18.7,81.7 r270 top (schematic designator CN29)
PE15 "HX-XH2.54-3PZZ" CONN-TH_3P-P2.50_HC-XH-3A-G#1 12.5,81.7 r270 top (schematic designator CN33)
PF0 "HX-XH2.54-3PZZ" CONN-TH_3P-P2.50_HC-XH-3A-G#1 62.1,81.7 r270 top (schematic designator CN16)
PF1 "HX-XH2.54-3PZZ" CONN-TH_3P-P2.50_HC-XH-3A-G#1 49.8,93.4 r270 top (schematic designator CN18)
PF2 "HX-XH2.54-3PZZ" CONN-TH_3P-P2.50_HC-XH-3A-G#1 43.6,93.4 r270 top (schematic designator CN20)
PF3 "HX-XH2.54-3PZZ" CONN-TH_3P-P2.50_HC-XH-3A-G#2 37.4,93.4 r270 top (schematic designator CN22)
PF4 "HX-XH2.54-3PZZ" CONN-TH_3P-P2.50_HC-XH-3A-G#3 31.2,93.4 r270 top (schematic designator CN24)
PF5 "HX-XH2.54-3PZZ" CONN-TH_3P-P2.50_HC-XH-3A-G#1 25,93.4 r270 top (schematic designator CN28)
PF6 "HX-XH2.54-3PZZ" CONN-TH_3P-P2.50_HC-XH-3A-G#1 18.8,93.4 r270 top (schematic designator CN30)
PF7 "HX-XH2.54-3PZZ" CONN-TH_3P-P2.50_HC-XH-3A-G#1 12.6,93.4 r270 top (schematic designator CN34)
PW05 "" BULETM-SMD_RF-BM-4044B2 104.999,2.383 r180 top locked (schematic designator U11)
Q1 "HB03P250S" TO-252-2_L6.6-W6.1-P4.60-LS10.0-BR-CW#1 127.2,39.7 r90 bottom
Q2 "HB03P250S" TO-252-2_L6.6-W6.1-P4.60-LS10.0-BR-CW#2 99.399,46.692 r270 bottom locked
Q3 "HB03P250S" TO-252-2_L6.6-W6.1-P4.60-LS10.0-BR-CW#2 99.4,36.192 r90 bottom locked
Q4 "HL3401" SOT-23-3_L3.0-W1.7-P0.95-LS2.9-BR 93.3,33.85 r0 bottom
Q5 "SS8050" SOT-23-3_L2.9-W1.3-P1.90-LS2.4-BR 91,40.5 r180 bottom
Q6 "HL3401" SOT-23-3_L3.0-W1.7-P0.95-LS2.9-BR 63.4,31.7 r90 bottom
R1 "10K" R0603#1 49.4,60.9 r270 bottom
R2 "10K" R0603#1 51.6,49.1 r90 bottom
R3 "10K" R0603#1 53.9,58.1 r180 bottom
R4 "31.6kΩ" R0603#2 26.1,27.2 r0 top
R5 "31.6kΩ" R0603#2 26.098,21.5 r0 top
R6 "10K" R0603#1 23.1,17.5 r90 bottom
R7 "10K" R0603#1 20.1,17.5 r90 bottom
R8 "10K" R0603#1 21.6,17.5 r90 bottom
R9 "10K" R0603#1 17.1,17.5 r90 bottom
R10 "10K" R0603#1 18.6,17.5 r90 bottom
R11 "31.6kΩ" R0603#2 97,35 r270 top
R12 "31.6kΩ" R0603#2 86,79.3 r270 top
R13 "31.6kΩ" R0603#2 84.6,3.7 r180 top
R14 "31.6kΩ" R0603#2 92.1,35 r270 top
R15 "31.6kΩ" R0603#2 26,33 r0 top
R16 "1kΩ" R0603#1 115.5,2.5 r0 top
R17 "10K" R0603#3 97.25,19.45 r270 top
R18 "10K" R0603#1 32.8,18.1 r90 bottom
R19 "10K" R0603#3 34.3,18.1 r90 bottom
R20 "10K" R0603#1 37.3,18.1 r90 bottom
R21 "10K" R0603#3 35.8,18.1 r90 bottom
R22 "10K" R0603#2 82.2,25.4 r180 bottom
R23 "10K" R0603#3 29.7,40.701 r180 top
R24 "10K" R0603#3 29.7,39.201 r180 top
R25 "31.6kΩ" R0603#1 69.3,28.5 r0 bottom
R26 "31.6kΩ" R0603#2 66.6,25.6 r180 bottom
R27 "31.6kΩ" R0603#2 69.6,25.6 r180 bottom
R28 "10K" R0603#3 58,12.3 r90 top
R29 "10K" R0603#3 60.9,12.3 r90 top
R30 "31.6kΩ" R0603#3 91.2,37.7 r180 bottom
R31 "31.6kΩ" R0603#3 93.5,38.5 r270 bottom
R32 "31.6kΩ" R0603#3 93.5,41.5 r90 bottom
R33 "1kΩ" R0603#3 115.6,8.7 r180 top
Slave_1 "ZX-XH2.54-3PZZ" CONN-TH_3P-P2.54_2501S-3P 91.4,93.44 r270 top (schematic designator CN1)
Slave_2 "ZX-XH2.54-3PZZ" CONN-TH_3P-P2.54_2501S-3P 91.4,83 r270 top (schematic designator CN2)
Slave_3 "ZX-XH2.54-3PZZ" CONN-TH_3P-P2.54_2501S-3P 98.9,93.4 r270 top (schematic designator CN3)
Slave_4 "ZX-XH2.54-3PZZ" CONN-TH_3P-P2.54_2501S-3P 98.9,83 r270 top (schematic designator CN4)
Slave_5 "ZX-XH2.54-3PZZ" CONN-TH_3P-P2.54_2501S-3P 106.4,93.5 r270 top (schematic designator CN5)
Slave_6 "ZX-XH2.54-3PZZ" CONN-TH_3P-P2.54_2501S-3P 106.4,83.1 r270 top (schematic designator CN6)
Slave_7 "ZX-XH2.54-3PZZ" CONN-TH_3P-P2.54_2501S-3P 113.9,93.5 r270 top (schematic designator CN7)
Slave_8 "ZX-XH2.54-3PZZ" CONN-TH_3P-P2.54_2501S-3P 113.9,83.1 r270 top (schematic designator CN8)
Slave_Power "MT-0-102-A101-M200-RS" SW-TH_MT-0-103-A101-M200-RS#2 119.6,37.599 r270 top locked (schematic designator U3)
STM32F407ZGT6 "STM32F407ZGT6" LQFP-144_L20.0-W20.0-P0.50-LS22.0-BL 47,54.5 r90 top locked (schematic designator U1)
SW3 "WS-1004-ARL10026" SW-TH_WS-1004-ARL10026 21.5,10 r0 top
U5 "2.54-2*5" HDR-TH_10P-P2.54-V-F-R2-C5-S2.54 90.5,11.4 r270 top locked
U6 "MTP125-1105S1" HDR-TH_5P-P2.54-V-M 113.3,56.02 r90 top
U7 "MTP125-1105S1" HDR-TH_5P-P2.54-V-M 116.1,56 r90 top
U9 "TPS54560DDAR" SOIC-8_L5.0-W4.0-P1.27-LS6.0-BL-EP2.0 79.831,29.035 r270 bottom locked
U12 "B4B-XH-A(LF)(SN)" CONN-TH_B4B-XH-A-LF-SN 76.5,16.7 r180 top locked
U13 "74HC08D,653" SOIC-14_L8.7-W3.9-P1.27-LS6.0-BL 14.4,42.7 r90 bottom locked
U16 "74HC04D,653" SOIC-14_L8.7-W3.9-P1.27-LS6.0-BL 14.5,55.1 r90 bottom locked
U17 "" SOIC-14_L8.7-W3.9-P1.27-LS6.0-BL 23.4,42.7 r90 bottom locked
UART4 "ZX-XH2.54-4PZZ" CONN-TH_4P-P2.50_4PIN#1 113.8,70.4 r270 top (schematic designator CN12)
UART5 "ZX-XH2.54-4PZZ" CONN-TH_4P-P2.50_4PIN#2 106.2,70.4 r270 top (schematic designator CN13)
USART1 "ZX-XH2.54-4PZZ" CONN-TH_4P-P2.50_4PIN#3 83.4,70.3 r270 top (schematic designator CN10)
USART6 "ZX-XH2.54-4PZZ" CONN-TH_4P-P2.50_4PIN#1 91,70.3 r270 top (schematic designator CN14)
USART12 "ZX-XH2.54-4PZZ" CONN-TH_4P-P2.50_4PIN#1 98.6,70.35 r270 top (schematic designator CN11)
USB "TYPE-C 16PIN 2MD(073)" USB-C-SMD_TYPE-C-16PIN-2MD-073 59.2,5.1 r0 top locked (schematic designator USB1)
XT60 "XT60PW-M" CONN-TH_XT60PW-M 121.9,22.9 r180 top locked (schematic designator CN9)

## Footprints (in the part's own frame and the unit in brackets; to place one, negate y for a bottom-side part, rotate by r counter-clockwise, add the part's x,y. Pads: shape width x height; smd on the part's side, far side on the other; paste and mask are expansions set on the pad)
BULETM-SMD_RF-BM-4044B2 [mil]
  rect 94.5x31.5 smd: 1(-220.5,50.5) 2(-220.5,0.5) 3(-220.5,-49.5) 4(-220.5,-99.5) 5(-220.5,-149.5) 6(-220.5,-199.5) 7(220.5,-199.5) 8(220.5,-149.5) 9(220.5,-99.5) 10(220.5,-49.5) 11(220.5,0.5) 12(220.5,50.5)
  silkscreen extent -255,-229 221,270
C0603#1 [mil]
  rect 31.5x35.4 smd: 1(-27.6,0) 2(27.5,0)
  silkscreen extent -55,-28 55,28
C0603#2 [mil]
  rect 31.5x35.4 smd: 1(-27.5,0) 2(27.6,0)
  silkscreen extent -55,-28 55,28
C0603#3 [mil]
  rect 31.5x35.4 smd: 1(-27.6,0) 2(27.6,0)
  silkscreen extent -55,-28 55,28
C0805#1 [mil]
  rect 55.5x53.1 smd paste-3937 mask+0: 1(-39.3,0) 2(39.4,0)
  silkscreen extent -77,-36 77,36
C0805#2 [mil]
  rect 55.5x53.1 smd paste-3937 mask+0: 1(-39.4,0) 2(39.3,0)
  silkscreen extent -77,-36 77,36
CAP-SMD_BD6.3-L6.6-W6.6-LS7.3-FD-H7.7 [mm]
  rect 3.5x1.199 smd: 1(-2.67,0) 2(2.67,0)
  silkscreen extent -3.38,-3.38 3.38,3.38
CONN-TH_3P-P2.50_HC-XH-3A-G#1 [mil]
  rect 60x60 hole 36 paste+0 mask+0: 1(-98.4,0)
  round 60 hole 36 paste+0 mask+0: 2(0,0) 3(98.4,0)
  silkscreen extent -197,-95 197,138
CONN-TH_3P-P2.50_HC-XH-3A-G#2 [mil]
  rect 60x60 hole 36 paste+0 mask+0: 1(-98.5,0)
  round 60 hole 36 paste+0 mask+0: 2(0,0) 3(98.4,0)
  silkscreen extent -197,-95 197,138
CONN-TH_3P-P2.50_HC-XH-3A-G#3 [mil]
  rect 60x60 hole 36 paste+0 mask+0: 1(-98.4,0)
  round 60 hole 36 paste+0 mask+0: 2(0,0) 3(98.5,0)
  silkscreen extent -197,-95 197,138
CONN-TH_3P-P2.54_2501S-3P [mil]
  rect 63x63 hole 39.4: 1(-100,0)
  round 63 hole 39.4: 2(0,0) 3(100,0)
  silkscreen extent -196,-93 198,132
CONN-TH_4P-P2.50-XH2.54-4P#1 [mm]
  round 1.699 hole 1.049 paste+0 mask+0: 1(3.749,0) 2(1.25,0) 3(-1.25,0) 4(-3.752,0)
  silkscreen extent -6.25,-3.42 6.25,2.37
CONN-TH_4P-P2.50-XH2.54-4P#2 [mm]
  round 1.699 hole 1.049 paste+0 mask+0: 1(3.752,0) 2(1.25,0) 3(-1.25,0) 4(-3.749,0)
  silkscreen extent -6.25,-3.42 6.25,2.37
CONN-TH_4P-P2.50_4PIN#1 [mil]
  rect 60x63 hole 43.3: 1(-147.7,0)
  round 63 hole 43.3: 2(-49.3,0) 3(49.2,0) 4(147.6,0)
  silkscreen extent -245,-95 245,140
CONN-TH_4P-P2.50_4PIN#2 [mil]
  rect 60x63 hole 43.3: 1(-147.6,0)
  round 63 hole 43.3: 2(-49.2,0) 3(49.2,0) 4(147.7,0)
  silkscreen extent -245,-95 245,140
CONN-TH_4P-P2.50_4PIN#3 [mil]
  rect 60x63 hole 43.3: 1(-147.7,0)
  round 63 hole 43.3: 2(-49.2,0) 3(49.2,0) 4(147.6,0)
  silkscreen extent -245,-95 245,140
CONN-TH_8P-P2.54_LX_XDFH-0254-2X4P [mm]
  rect 1.699x1.699 hole 1.1 paste+0 mask+0: 1(-3.81,-1.27)
  round 1.699 hole 1.1 paste+0 mask+0: 2(-3.81,1.27) 3(-1.27,-1.27) 4(-1.27,1.27) 5(1.27,-1.27) 6(1.27,1.27) 7(3.81,-1.27) 8(3.81,1.27)
  silkscreen extent -8.88,-4.5 8.88,4.5
CONN-TH_18P-P2.54_LX_XDFH-0254-2X9P [mm]
  rect 1.699x1.699 hole 1.1: 1(-10.16,-1.27)
  round 1.699 hole 1.1: 2(-10.16,1.27) 3(-7.62,-1.27) 4(-7.62,1.27) 5(-5.08,-1.27) 6(-5.08,1.27) 7(-2.54,-1.27) 8(-2.54,1.27) 9(0,-1.27) 10(0,1.27) 11(2.54,-1.27) 12(2.54,1.27) 13(5.08,-1.27) 14(5.08,1.27) 15(7.62,-1.27) 16(7.62,1.27) 17(10.157,-1.27) 18(10.157,1.27)
  silkscreen extent -15.23,-4.5 15.23,4.5
CONN-TH_B4B-XH-A-LF-SN [mm]
  round 1.699 hole 1.001: 1(3.749,0) 2(1.25,0) 3(-1.25,0) 4(-3.752,0)
  silkscreen extent -6.22,-2.41 6.22,3.43
CONN-TH_XT60PW-M [mm]
  round 4.5 hole 2.901 paste+0 mask+0: 1(3,-3.602) 2(3,3.599)
  oval 2.2x1.199 hole 0.599 slot 1.6 at 0 deg paste+0 mask+0: 3(-3,6.749) 4(-3,-6.751)
  silkscreen extent -13.16,-7.75 4.97,7.75
CRYSTAL-TH_L11.1-W4.7-P4.88 [mil]
  round 55.1 hole 31.5 paste+0 mask+0: 1(-96.1,0) 2(96,0)
  silkscreen extent -220,-93 221,93
F1206 [mil]
  rect 46.9x68 smd: 1(-56.9,0) 2(56.9,0)
  silkscreen extent -89,-43 89,43
F2920 [mm]
  rect 1.999x5.301 smd: 1(-3.299,0) 2(3.299,0)
  silkscreen extent -4.6,-2.9 4.6,2.9
FC-135R_L3.2-W1.5 [mm]
  rect 1.001x1.801 smd: 1(-1.25,0) 2(1.25,0)
  silkscreen extent -0.51,-0.76 0.51,0.76
HDR-TH_3P-P2.54-V-M-1 [mil]
  rect 62x70.9 hole 47.2: 1(-100,0)
  round 70.9 hole 47.2: 2(0,0) 3(100,0)
  silkscreen extent -150,-50 150,50
HDR-TH_5P-P2.54-H-M-W10.4-N [mil]
  rect 63x63 hole 41.3: 1(-200,0)
  round 63 hole 41.3: 2(-100,0) 3(0,0) 4(100,0) 5(200,0)
  silkscreen extent -250,-173 250,50
HDR-TH_5P-P2.54-V-M [mm]
  rect 1.699x1.699 hole 1.1: 1(-5.08,0)
  round 1.699 hole 1.1: 2(-2.54,0) 3(0,0) 4(2.54,0) 5(5.08,0)
  silkscreen extent -6.35,-1.27 6.35,1.27
HDR-TH_8P-P2.54-V-M-R2-C4-S2.54 [mm]
  rect 1.699x1.699 hole 1.1: 1(-3.81,-1.27)
  round 1.699 hole 1.1: 2(-3.81,1.27) 3(-1.27,-1.27) 4(-1.27,1.27) 5(1.27,-1.27) 6(1.27,1.27) 7(3.81,-1.27) 8(3.81,1.27)
  silkscreen extent -5.08,-2.54 5.08,2.54
HDR-TH_10P-P2.54-V-F-R2-C5-S2.54 [mil]
  rect 62x66.9 hole 43.3: 1(-200,-50)
  round 66.9 hole 43.3: 2(-200,50) 3(-100,-50) 4(-100,50) 5(0,-50) 6(0,50) 7(100,-50) 8(100,50) 9(200,-50) 10(200,50)
  silkscreen extent -260,-100 260,100
IDC-TH_10P-P2.54_C5665 [mil]
  round 60 hole 39.4 paste+0 mask+0: 1(-200,-50) 2(-200,50) 3(-100,-50) 4(-100,50) 5(0,-50) 6(0,50) 7(100,-50) 8(100,50) 9(200,-50) 10(200,50)
  silkscreen extent -400,-175 400,173
IND-SMD_L4.6-W4.1-A [mm]
  rect 1.501x2.499 smd: 1(-1.9,0) 2(1.9,0)
  silkscreen extent -2.3,-2.05 2.3,2.05
IND-SMD_L4.6-W4.1_MHCI04015 [mm]
  rect 1.501x2.499 smd: 1(-1.849,0) 2(1.849,0)
  silkscreen extent -2.3,-2.05 2.3,2.05
L1206 [mil]
  rect 58.5x68 smd paste-3937 mask+0: 1(-62.7,0) 2(62.7,0)
  silkscreen extent -101,-43 101,43
LED0805-FD_GL0805UG01#1 [mm]
  rect 1.3x1.4 smd: 1(-1.052,0) 2(1.049,0)
  silkscreen extent -1.99,-1.01 2.22,1.04
LED0805-FD_GL0805UG01#2 [mm]
  rect 1.3x1.4 smd: 1(-1.049,0) 2(1.052,0)
  silkscreen extent -1.99,-1.01 2.23,1.04
LED0805-R-RD_RED#1 [mm]
  rect 1.001x1.4 smd: 1(1.052,0) 2(-1.049,0)
  silkscreen extent -2.22,-1.04 1.99,1.02
LED0805-R-RD_RED#2 [mm]
  rect 1.001x1.4 smd: 1(1.049,0) 2(-1.052,0)
  silkscreen extent -2.23,-1.04 1.99,1.02
LED0805-RD_BLUE [mm]
  rect 1.001x1.25 smd: 1(-1.1,0) 2(1.1,0)
  silkscreen extent -2.1,-0.95 1.98,0.96
LQFP-144_L20.0-W20.0-P0.50-LS22.0-BL [mil]
  oval 11x78.7 smd: 1(-344.5,-425.2) 2(-324.8,-425.2) 3(-305.1,-425.2) 4(-285.4,-425.2) 5(-265.7,-425.2) 6(-246,-425.2) 7(-226.3,-425.2) 8(-206.6,-425.2) 9(-187,-425.2) 10(-167.3,-425.2) 11(-147.6,-425.2) 12(-127.9,-425.2) 13(-108.2,-425.2) 14(-88.5,-425.2) 15(-68.9,-425.2) 16(-49.2,-425.2) 17(-29.5,-425.2) 18(-9.8,-425.2) 19(9.9,-425.2) 20(29.6,-425.2) 21(49.3,-425.2) 22(68.9,-425.2) 23(88.6,-425.2) 24(108.3,-425.2) 25(128,-425.2) 26(147.7,-425.2) 27(167.4,-425.2) 28(187,-425.2) 29(206.7,-425.2) 30(226.4,-425.2) 31(246.1,-425.2) 32(265.8,-425.2) 33(285.5,-425.2) 34(305.2,-425.2) 35(324.8,-425.2) 36(344.5,-425.2) 73(344.5,425.2) 74(324.8,425.2) 75(305.2,425.2) 76(285.5,425.2) 77(265.8,425.2) 78(246.1,425.2) 79(226.4,425.2) 80(206.7,425.2) 81(187,425.2) 82(167.4,425.2) 83(147.7,425.2) 84(128,425.2) 85(108.3,425.2) 86(88.6,425.2) 87(68.9,425.2) 88(49.3,425.2) 89(29.6,425.2) 90(9.9,425.2) 91(-9.8,425.2) 92(-29.5,425.2) 93(-49.2,425.2) 94(-68.9,425.2) 95(-88.5,425.2) 96(-108.2,425.2) 97(-127.9,425.2) 98(-147.6,425.2) 99(-167.3,425.2) 100(-187,425.2) 101(-206.6,425.2) 102(-226.3,425.2) 103(-246,425.2) 104(-265.7,425.2) 105(-285.4,425.2) 106(-305.1,425.2) 107(-324.8,425.2) 108(-344.5,425.2)
  oval 78.7x11 smd: 37(425.2,-344.5) 38(425.2,-324.8) 39(425.2,-305.1) 40(425.2,-285.4) 41(425.2,-265.8) 42(425.2,-246.1) 43(425.2,-226.4) 44(425.2,-206.7) 45(425.2,-187) 46(425.2,-167.3) 47(425.2,-147.6) 48(425.2,-128) 49(425.2,-108.3) 50(425.2,-88.6) 51(425.2,-68.9) 52(425.2,-49.2) 53(425.2,-29.5) 54(425.2,-9.8) 55(425.2,9.8) 56(425.2,29.5) 57(425.2,49.2) 58(425.2,68.9) 59(425.2,88.6) 60(425.2,108.3) 61(425.2,127.9) 62(425.2,147.6) 63(425.2,167.3) 64(425.2,187) 65(425.2,206.7) 66(425.2,226.4) 67(425.2,246.1) 68(425.2,265.7) 69(425.2,285.4) 70(425.2,305.1) 71(425.2,324.8) 72(425.2,344.5) 109(-425.2,344.5) 110(-425.2,324.8) 111(-425.2,305.1) 112(-425.2,285.4) 113(-425.2,265.7) 114(-425.2,246.1) 115(-425.2,226.4) 116(-425.2,206.7) 117(-425.2,187) 118(-425.2,167.3) 119(-425.2,147.6) 120(-425.2,127.9) 121(-425.2,108.3) 122(-425.2,88.6) 123(-425.2,68.9) 124(-425.2,49.2) 125(-425.2,29.5) 126(-425.2,9.8) 127(-425.2,-9.8) 128(-425.2,-29.5) 129(-425.2,-49.2) 130(-425.2,-68.9) 131(-425.2,-88.6) 132(-425.2,-108.3) 133(-425.2,-128) 134(-425.2,-147.6) 135(-425.2,-167.3) 136(-425.2,-187) 137(-425.2,-206.7) 138(-425.2,-226.4) 139(-425.2,-246.1) 140(-425.2,-265.8) 141(-425.2,-285.4) 142(-425.2,-305.1) 143(-425.2,-324.8) 144(-425.2,-344.5)
  silkscreen extent -410,-443 397,397
M3 [mm]
  round 7.6 hole 3.2: 17(0,0)
OLED-TH_HS96L01W4S03 [mm]
  rect 1.699x1.699 hole 1.001: 1(-7.62,0)
  round 1.699 hole 1.001: 2(-5.08,0) 3(-2.54,0) 4(0,0) 5(2.54,0) 6(5.08,0) 7(7.62,0)
  silkscreen extent -8.89,-1.27 8.89,1.29
OLED-TH_L27.8-W27.2-P2.54_C9900033791 [mm]
  rect 1.801x1.801 hole 1.049 paste+0 mask+0: 1(-3.81,0)
  round 1.801 hole 1.049 paste+0 mask+0: 2(-1.27,0) 3(1.27,0) 4(3.81,0)
  silkscreen extent -5.08,-1.27 5.08,1.44
R0603#1 [mil]
  rect 31.8x34 smd paste-3937 mask+0: 1(-29.7,0) 2(29.7,0)
  silkscreen extent -55,-26 55,26
R0603#2 [mil]
  rect 31.8x34 smd paste-3937 mask+0: 1(-29.7,0) 2(29.6,0)
  silkscreen extent -55,-26 54,26
R0603#3 [mil]
  rect 31.8x34 smd paste-3937 mask+0: 1(-29.6,0) 2(29.7,0)
  silkscreen extent -55,-26 55,26
SMA_L4.3-W2.6-LS5.0-FD [mm]
  rect 1.801x1.621 smd: 1(-2.149,-0.01) 2(2.151,0.01)
  silkscreen extent -2.17,-1.32 2.19,1.29
SMB_L4.6-W3.5-LS5.3-BI#1 [mil]
  rect 70.9x94.5 smd: 1(-82.3,0) 2(82.4,0)
  silkscreen extent -102,-75 105,75
SMB_L4.6-W3.5-LS5.3-BI#2 [mil]
  rect 70.9x94.5 smd: 1(-82.3,0) 2(82.3,0)
  silkscreen extent -102,-75 105,75
SMB_L4.6-W3.6-LS5.4-RD [mil]
  rect 80.6x88.2 smd: 1(-95,0) 2(95,0)
  silkscreen extent -88,-74 88,74
SOD-80_L3.5-W1.5-RD [mil]
  rect 56.7x63.8 smd: 1(-69.5,0) 2(69.4,0)
  silkscreen extent -33,-32 33,32
SOIC-8_L5.0-W4.0-P1.27-LS6.0-BL-EP2.0 [mil]
  oval 22.6x80.2 smd: 1(-75,-109) 2(-25,-109) 3(25,-109) 4(75,-109) 5(75,109.1) 6(25,109.1) 7(-25,109.1) 8(-75,109.1)
  rect 78.7x78.7 smd: 9(0,0)
  silkscreen extent -110,-115 100,60
SOIC-14_L8.7-W3.9-P1.27-LS6.0-BL [mm]
  oval 0.574x2.037 smd: 1(-3.81,-2.619) 2(-2.54,-2.619) 3(-1.27,-2.619) 4(0,-2.619) 5(1.27,-2.619) 6(2.54,-2.619) 7(3.81,-2.619) 8(3.81,2.619) 9(2.54,2.619) 10(1.27,2.619) 11(0,2.619) 12(-1.27,2.619) 13(-2.54,2.619) 14(-3.81,2.619)
  silkscreen extent -4.7,-2.92 4.38,1.4
SOP-8_L4.9-W3.9-P1.27-LS6.0-BL#1 [mm]
  oval 0.63x1.864 smd: 1(-1.905,-2.685) 2(-0.635,-2.685) 3(0.635,-2.685) 4(1.905,-2.685) 5(1.905,2.682) 6(0.635,2.682) 7(-0.635,2.682) 8(-1.905,2.682)
  silkscreen extent -2.82,-2.83 2.58,1.52
SOP-8_L4.9-W3.9-P1.27-LS6.0-BL#2 [mm]
  oval 0.63x1.864 smd: 1(-1.905,-2.682) 2(-0.635,-2.682) 3(0.635,-2.682) 4(1.905,-2.682) 5(1.905,2.682) 6(0.635,2.682) 7(-0.635,2.682) 8(-1.905,2.682)
  silkscreen extent -2.82,-2.83 2.58,1.52
SOT-23-3_L2.9-W1.3-P1.90-LS2.4-BR [mm]
  rect 1.001x0.65 smd: 1(1.001,-0.95) 2(1.001,0.95) 3(-0.998,0)
  silkscreen extent -0.73,-1.53 0.73,1.53
SOT-23-3_L3.0-W1.7-P0.95-LS2.9-BR [mm]
  rect 1.036x0.531 smd: 1(1.1,-0.95) 2(1.1,0.95) 3(-1.102,0)
  silkscreen extent -0.86,-1.53 0.86,1.53
SW-SMD_L6.0-W3.3-LS8.0_TS-1101-C-W [mm]
  rect 1.199x1.001 smd: 1(-3.701,0) 2(3.701,0)
  silkscreen extent -3,-1.8 3,1.8
SW-TH_DSWB01LHGET [mil]
  round 63 hole 39.4: 1(0,150) 2(0,-150)
  silkscreen extent -80,-201 84,199
SW-TH_MT-0-103-A101-M200-RS#1 [mil]
  rect 70.9x118.1 hole 47.2 slot 98.4 at 90 deg: 1(-185,0)
  oval 70.9x118.1 hole 47.2 slot 98.4 at 90 deg: 2(0,0) 3(185.1,0)
  silkscreen extent -255,-158 256,158
SW-TH_MT-0-103-A101-M200-RS#2 [mil]
  rect 70.9x118.1 hole 47.2 slot 98.4 at 90 deg: 1(-185.1,0)
  oval 70.9x118.1 hole 47.2 slot 98.4 at 90 deg: 2(0,0) 3(185,0)
  silkscreen extent -255,-158 256,158
SW-TH_WS-1004-ARL10026 [mil]
  rect 78.7x78.7 hole 51.2: 1(-206.7,127.9) 2(-206.7,17.7) 3(-206.7,-128) 4(206.7,127.9) 5(206.7,17.7) 6(206.7,-128)
  silkscreen extent -200,-200 200,200
TO-252-2_L6.6-W6.1-P4.60-LS10.0-BR-CW#1 [mil]
  rect 110.2x51.2 smd: 1(129.6,-90.5) 3(129.6,90.6)
  rect 255.9x236.2 smd: 2(-129.6,0)
  silkscreen extent -164,-130 48,130
TO-252-2_L6.6-W6.1-P4.60-LS10.0-BR-CW#2 [mil]
  rect 110.2x51.2 smd: 1(129.6,-90.6) 3(129.6,90.5)
  rect 255.9x236.2 smd: 2(-129.6,0)
  silkscreen extent -164,-130 48,130
USB-C-SMD_TYPE-C-16PIN-2MD-073 [mil]
  oval 47.2x70.9 hole 23.6 slot 47.2 at 90 deg paste+0 mask+0: 13(-170.2,-93.5) 14(170.3,-93.5)
  oval 43.3x78.7 hole 23.6 slot 59.1 at 90 deg paste+0 mask+0: 13(-170.2,71.9) 14(170.3,71.9)
  rect 21.7x43.3 smd paste-3937 mask+0: A1B12(-125.9,93.5) A4B9(-94.4,93.5) B1A12(126,93.5) B4A9(94.5,93.5)
  rect 11.8x43.3 smd paste-3937 mask+0: A5(-49.2,93.5) A6(-9.8,93.5) A7(9.9,93.5) A8(49.3,93.5) B5(68.9,93.5) B6(29.6,93.5) B7(-29.5,93.5) B8(-68.9,93.5)
  Board Outline Layer circle w0.1: c113.8,51.4 r13.8
  Board Outline Layer circle w0.1: c-113.7,51.4 r13.8
  silkscreen extent -177,-196 180,24

## Via types
v1: diameter 0.6, hole 0.3, Top Layer to Bottom Layer, tented both sides, 722 vias
v2: diameter 0.6, hole 0.5, Top Layer to Bottom Layer, tented both sides, 24 vias
v3: diameter 0.6, hole 0.5, Top Layer to Bottom Layer, 8 vias
v4: diameter 0.61, hole 0.305, Top Layer to Bottom Layer, tented both sides, 4 vias